# Allegro board PCB_ESP32-P4X_Function_EV_Board_V1.6_20250618.brd
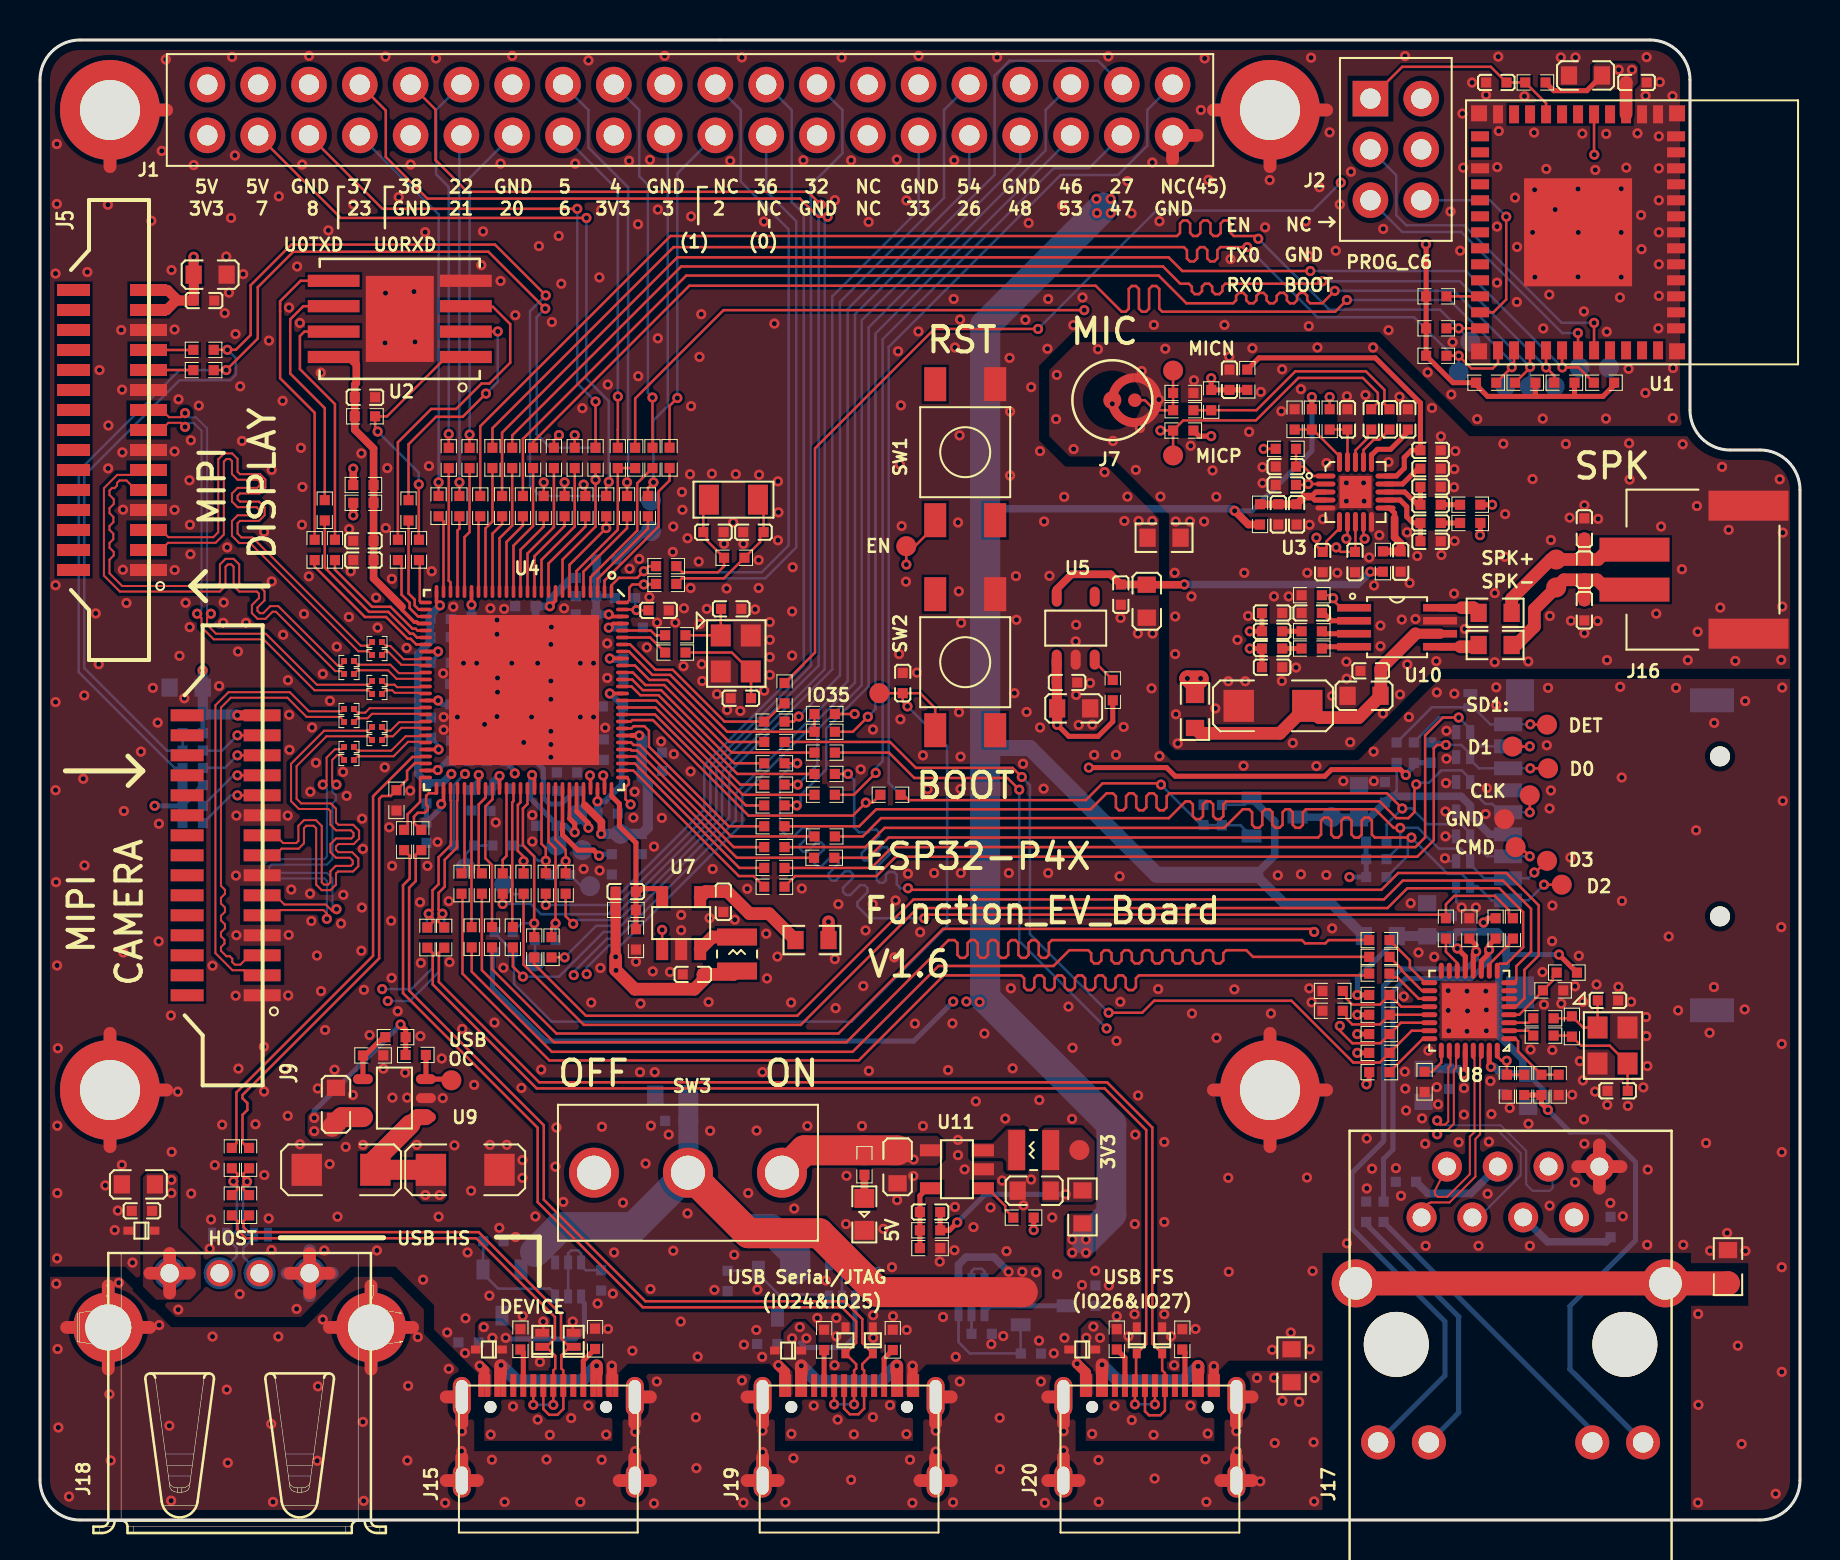
[diagram p0: board, top side]
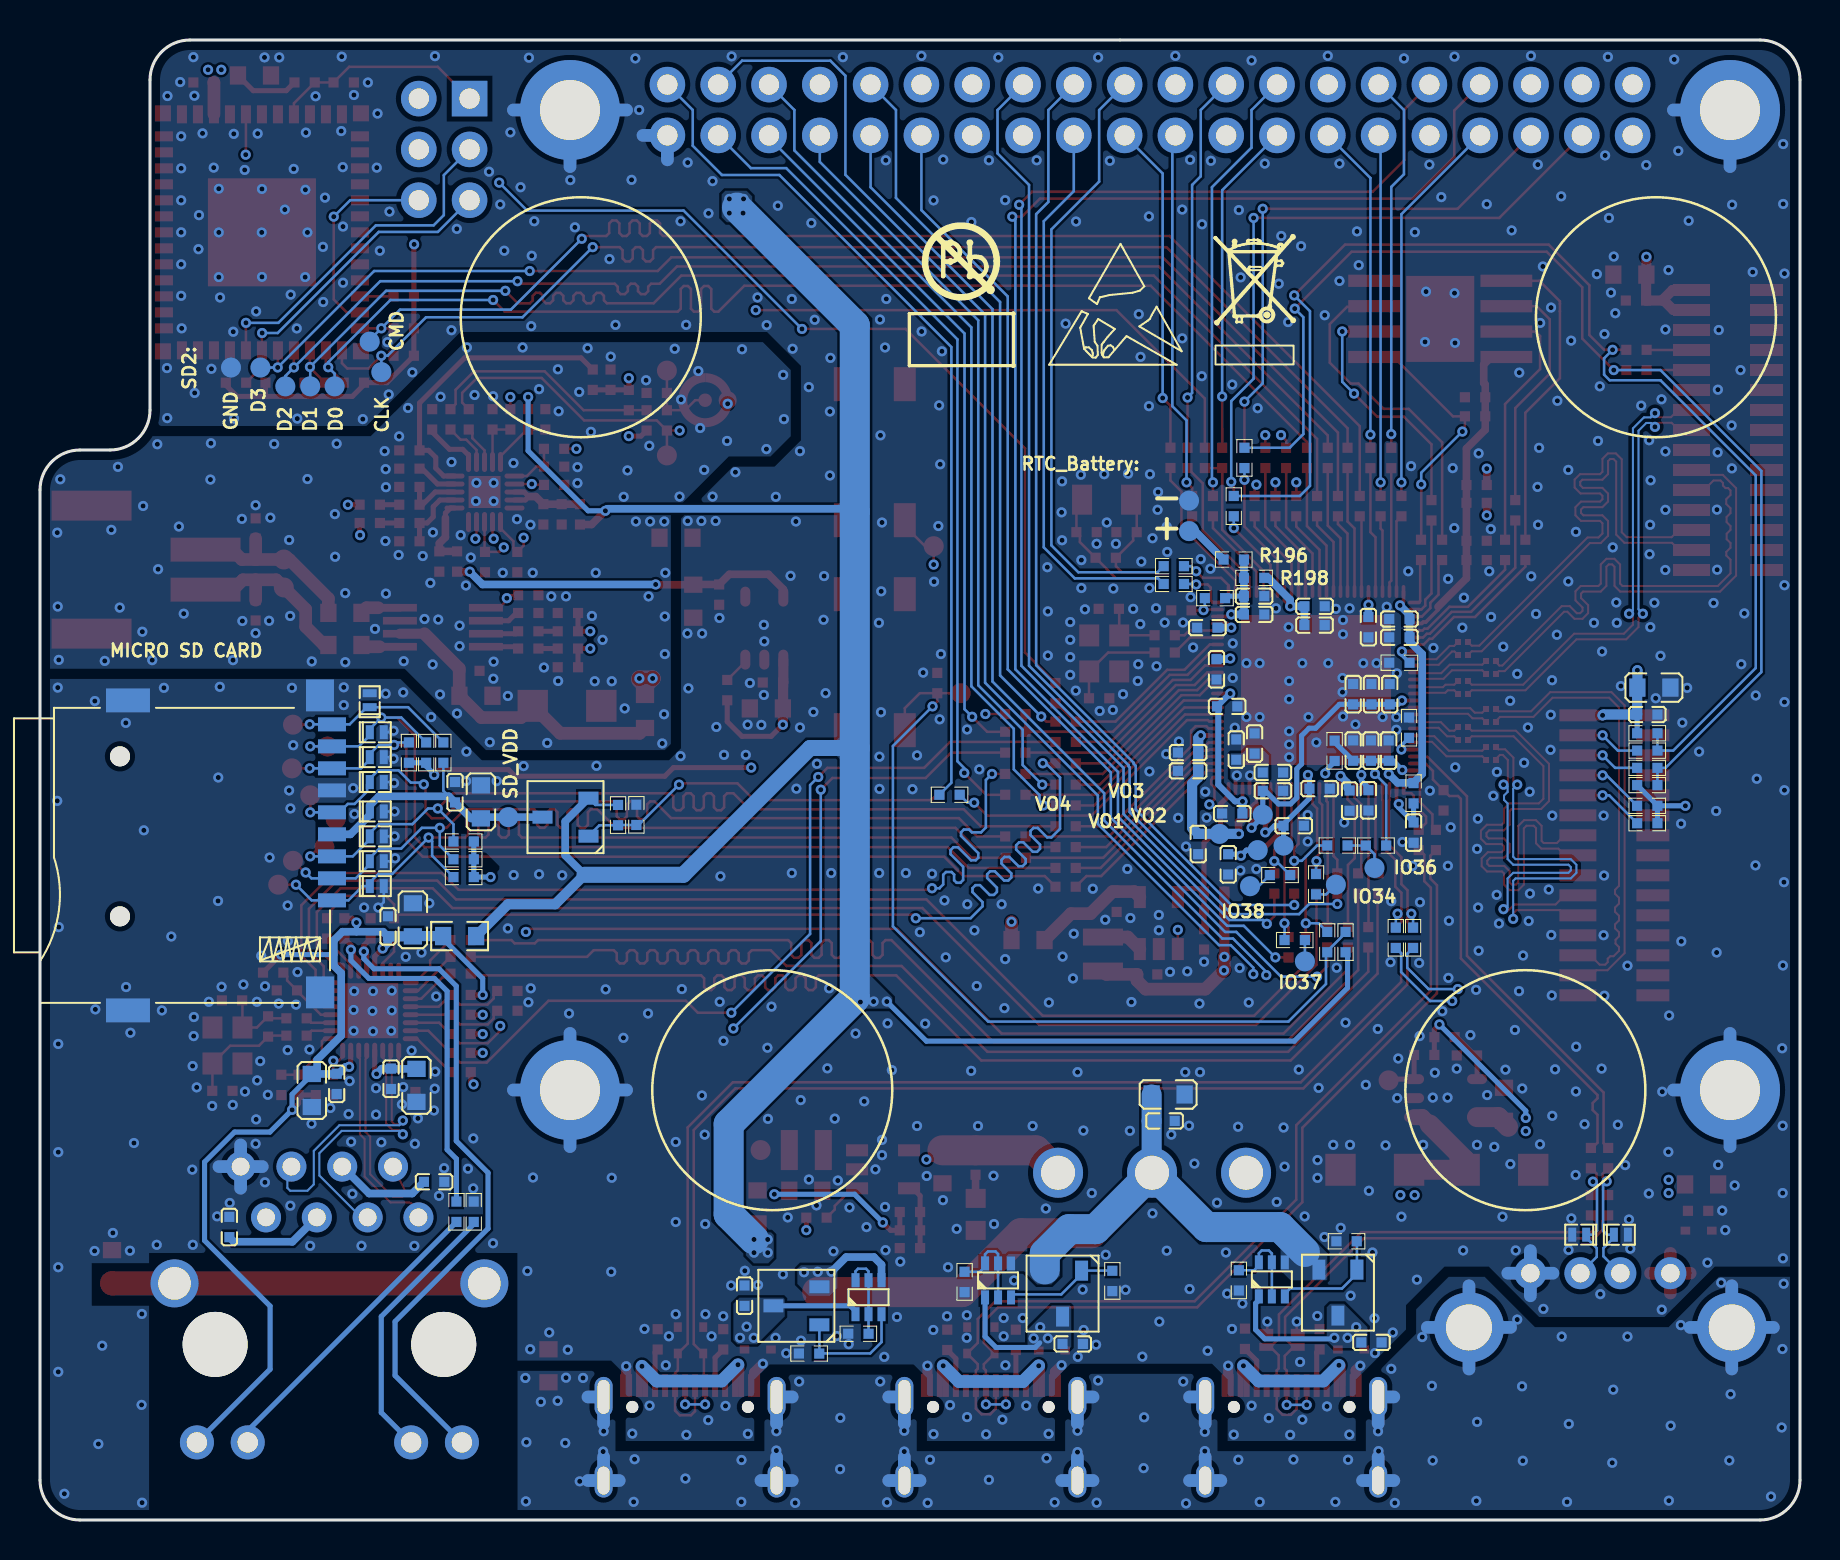
[diagram p1: board, bottom side, seen from below]

Outline 88 x 74 mm; copper layers: TOP, GND, POWER, BOTTOM. Coordinates in mm from the lower left corner of the outline.
Outline path: 0,72 0,2 arc(0.59,0.59) 2,0 86,0 arc(87.41,0.59) 88,2 88,51.5 arc(87.41,52.91) 86,53.5 84.5,53.5 arc(83.09,54.09) 82.5,55.5 82.5,72 arc(81.91,73.41) 80.5,74 2,74 arc(0.59,73.41) 0,72

## Design rules (mm)
net group CSI_A_CLKN: nets CSI_A_CLKN CSI_CLKN
net group CSI_A_CLKP: nets CSI_A_CLKP CSI_CLKP
net group CSI_A_DATA0N: nets CSI_A_DATA0N CSI_DATA0N
net group CSI_A_DATA0P: nets CSI_A_DATA0P CSI_DATA0P
net group CSI_A_DATA1N: nets CSI_A_DATA1N CSI_DATA1N
net group CSI_A_DATA1P: nets CSI_A_DATA1P CSI_DATA1P
net group DP_USB1P1: nets USB1P1_N USB1P1_P
net group DP_USB_DM_C: nets USB_DM_C USB_DP_C
net group DSI_CLKN: nets DSI_A_CLKN DSI_CLKN
net group DSI_CLKP: nets DSI_A_CLKP DSI_CLKP
net group DSI_DATA0N: nets DSI_A_DATA0N DSI_DATA0N
net group DSI_DATA0P: nets DSI_A_DATA0P DSI_DATA0P
net group DSI_DATA1N: nets DSI_A_DATA1N DSI_DATA1N
net group DSI_DATA1P: nets DSI_A_DATA1P DSI_DATA1P
net group RJ_RD: nets RD+ RD-
net group RJ_TD: nets TD+ TD-
net group USB1P1: nets GPIO24 GPIO25
net group USB2: nets USB_DM USB_DP

## Placement (name value [footprint] x y rotation side)
C1  10uF/10V(20%)  [C0603]  77.28 72.23 180 top
C2  0.1uF/50V(10%)  [C0402]  79.83 71.88 0 top
C7  10uF/10V(20%)  [C0603]  8.51 62.27 0 top
C8  1uF/16V(10%)  [C0402]  72.81 71.88 180 top
C10  0.1uF/50V(10%)  [C0402]  8.2 60.97 0 top
C14  0.1uF/50V(10%)  [C0402]  67.25 36.39 90 bottom
C15  10uF/10V(20%)  [C0603]  65.95 35.91 90 bottom
C16  0.1uF/50V(10%)  [C0402]  16.25 56.14 0 top
C18  22pF/50V(5%)  [C0402]  33.67 49.39 0 top
C19  22pF/50V(5%)  [C0402]  35.67 49.39 180 top
C20  1uF/16V(10%)  [C0402]  16.17 48.96 180 top
C21  0.1uF/50V(10%)  [C0402]  61.92 50.28 270 top
C22  0.1uF/50V(10%)  [C0402]  62.83 50.28 270 top
C23  22pF/50V(5%)  [C0402]  62.29 51.76 180 top
C24  22pF/50V(5%)  [C0402]  62.29 52.67 180 top
C25  0.1uF/50V(10%)  [C0402]  16.17 48 180 top
C26  22pF/50V(5%)  [C0402]  64.13 47.89 270 top
C27  22pF/50V(5%)  [C0402]  65.37 55.03 90 top
C28  22pF/50V(5%)  [C0402]  34.56 45.56 0 top
C29  22pF/50V(5%)  [C0402]  65.75 47.9 270 top
C30  0.1uF/50V(10%)  [C0402]  30.93 45.48 0 top
C31  10uF/10V(20%)  [C0603]  55.34 45.94 270 top
C32  1uF/16V(10%)  [C0402]  66.56 55.03 270 top
C33  0.1uF/50V(10%)  [C0402]  54.04 46.27 270 top
C34  1uF/16V(10%)  [C0402]  67.48 55.03 270 top
C35  1uF/16V(10%)  [C0402]  68.03 47.92 90 top
C36  1uF/16V(10%)  [C0402]  59.47 57.01 270 top
C37  1uF/16V(10%)  [C0402]  68.39 55.03 270 top
C38  22pF/50V(5%)  [C0402]  69.53 48.94 0 top
C39  1uF/16V(10%)  [C0402]  69.53 49.85 180 top
C40  1uF/16V(10%)  [C0402]  69.53 50.76 180 top
C41  22pF/50V(5%)  [C0402]  69.53 51.65 0 top
C42  1uF/16V(10%)  [C0402]  69.53 52.57 180 top
C43  1uF/16V(10%)  [C0402]  69.53 53.48 0 top
C44  0.1uF/50V(10%)(NC)  [C0402]  43.14 41.85 90 top
C45  22pF/50V(5%)  [C0402]  35.04 41.09 180 top
C46  10uF/10V(20%)  [C0603]  7.31 41.62 180 bottom
C47  0.1uF/50V(10%)  [C0402]  7.64 40.27 180 bottom
C48  0.1uF/50V(10%)  [C0402]  51.35 41.87 0 top
C49  10uF/10V(20%)  [C0603]  51.68 40.58 0 top
C50  1uF/16V(10%)  [C0402]  25.31 34.71 180 bottom
C51  1uF/16V(10%)  [C0402]  30.09 33.8 270 bottom
C53  22pF/50V(5%)(NC)  [C0402]  29.29 31.42 0 top
C54  4.7uF/6.3V(20%)  [C0402]  34.17 30.91 270 top
C55  1uF/16V(10%)  [C0402]  26.35 36.46 180 bottom
C56  1uF/16V(10%)  [C0402]  28.59 32.78 270 bottom
C57  22pF/50V(5%)  [C0402]  61.61 42.64 0 top
C58  0.1uF/50V(10%)  [C0402]  61.61 43.57 0 top
C59  0.1uF/50V(10%)  [C0402]  61.61 44.44 0 top
C60  22pF/50V(5%)  [C0402]  61.61 45.35 0 top
C61  22uF/6.3V(20%)  [C0402]  32.64 27.28 180 top
C62  1uF/16V(10%)  [C0402]  63.59 45.35 180 top
C63  100uF/10V(20%)  [C1206]  61.65 40.71 180 top
C64  20pF/50V(5%)  [C0402]  78.4 25.98 0 top
C65  10uF/10V(20%)  [C0603]  14.8 20.79 90 top
C66  1uF/16V(10%)  [C0402]  66.53 42.46 180 top
C67  10uF/10V(20%)(NC)  [C0603]  66.2 41.21 0 top
C68  20pF/50V(5%)  [C0402]  78.88 21.46 180 top
C69  22pF/50V(5%)(NC)  [C0402]  44.5 15.4 180 top
C70  10uF/10V(20%)  [C0603]  49.71 16.47 180 top
C71  10uF/10V(20%)  [C0603]  42.88 17.66 270 top
C72  100uF/10V(20%)  [C1206]  15.05 17.51 180 top
C73  10uF/10V(20%)  [C0603]  4.92 16.78 180 top
C74  0.1uF/50V(10%)  [C0402]  5.1 15.46 180 top
C75  100uF/10V(20%)  [C1206]  21.26 17.51 0 top
C76  1uF/16V(10%)  [C0402]  52.77 11.22 90 bottom
C77  330pF/50V(10%)(NC)  [C0402]  77.22 49.58 270 top
C78  330pF/50V(10%)(NC)  [C0402]  77.22 47.52 90 top
C79  22uF/10V(20%)  [C0603]  31.59 21.28 180 bottom
C80  0.1uF/50V(10%)  [C0402]  31.77 19.95 180 bottom
C81  330pF/50V(10%)(NC)  [C0402]  77.22 45.49 270 top
C82  10uF/6.3V(20%)  [C0402]  27.3 46.19 180 bottom
C83  0.1uF/50V(10%)  [C0402]  24.27 45.68 180 bottom
C84  0.1uF/50V(10%)  [C0402]  27.3 45.28 180 bottom
C85  0.1uF/50V(10%)  [C0402]  29.63 44.62 0 bottom
C86  0.1uF/50V(10%)  [C0402]  20.03 45.05 0 bottom
C87  10uF/6.3V(20%)  [C0402]  24.27 44.74 180 bottom
C88  0.1uF/50V(10%)  [C0402]  21.58 44.64 270 bottom
C89  0.1uF/50V(10%)  [C0402]  20.03 44.14 0 bottom
C90  0.1uF/50V(10%)  [C0402]  29.18 42.54 270 bottom
C91  1uF/16V(10%)  [C0402]  22.34 41.29 90 bottom
C92  0.1uF/50V(10%)  [C0402]  21.43 41.29 90 bottom
C93  10nF/50V(10%)  [C0402]  20.51 41.29 90 bottom
C94  0.1uF/50V(10%)  [C0402]  28.64 40.68 180 bottom
C95  10uF/6.3V(20%)  [C0402]  28.19 38.52 90 bottom
C96  0.1uF/50V(10%)  [C0402]  27.27 38.82 90 bottom
C97  0.1uF/50V(10%)  [C0402]  22.52 35.97 270 bottom
C98  4.7uF/6.3V(20%)  [C0402]  22.34 38.47 90 bottom
C99  0.1uF/50V(10%)  [C0402]  21.45 38.47 90 bottom
C100  10nF/50V(10%)  [C0402]  20.56 38.47 90 bottom
C101  0.1uF/50V(10%)  [C0402]  30.59 38.37 0 bottom
C102  10uF/6.3V(20%)  [C0402]  30.59 37.46 0 bottom
C103  0.1uF/50V(10%)  [C0402]  26.35 37.38 180 bottom
C104  1uF/16V(10%)  [C0402]  24.02 36.57 180 bottom
C105  0.1uF/50V(10%)  [C0402]  21.58 35.98 270 bottom
C107  10uF/6.3V(20%)  [C0402]  28.39 35.32 0 bottom
C108  10uF/10V(20%)  [C0603]  69.36 30.01 90 bottom
C109  0.1uF/50V(10%)  [C0402]  70.6 29.68 90 bottom
C110  1uF/16V(10%)  [C0402]  21.43 8.88 180 bottom
C111  0.1uF/50V(10%)  [C0402]  70.45 22.06 270 bottom
C112  0.1uF/50V(10%)  [C0402]  73.17 21.81 270 bottom
C113  10uF/10V(20%)  [C0603]  69.18 21.73 270 bottom
C114  10uF/10V(20%)  [C0603]  74.41 21.48 270 bottom
C115  0.1uF/50V(10%)  [C0402]  68.3 16.91 180 bottom
C116  0.1uF/50V(10%)  [C0402]  78.53 14.65 90 bottom
C117  1uF/16V(10%)  [C0402]  36.36 8.8 180 bottom
C118  0.1uF/50V(10%)  [C0402]  19.32 34.37 270 bottom
D3  BSDFN2C031U  [SOD882]  71.16 35.43 0 bottom
D4  BSDFN2C031U  [SOD882]  71.16 34.18 0 bottom
D5  BSDFN2C031U  [SOD882]  71.52 40.99 270 bottom
D6  BSDFN2C031U  [SOD882]  71.16 36.9 0 bottom
D7  BSDFN2C031U  [SOD882]  71.16 32.94 0 bottom
D8  BSDFN2C031U  [SOD882]  71.16 31.69 0 bottom
D10  BSDFN2C031U  [SOD882]  71.16 39.39 0 bottom
D11  BSDFN2C031U  [SOD882]  71.16 38.14 0 bottom
D12  RED LED  [LED0603]  41.21 15.28 90 top
D13  LESD5D5.0CT1G  [SOD523]  22.44 8.52 0 top
D14  ESD7951ST5G  [SOD882]  25.11 9.01 270 top
D15  LESD5D5.0CT1G  [SOD523]  5.07 14.47 0 top
D16  ESD7951ST5G  [SOD882]  26.69 9.01 270 top
D17  LESD5D5.0CT1G  [SOD523]  40.27 8.98 270 top
D18  LESD5D5.0CT1G  [SOD523]  41.64 8.98 270 top
D19  LESD5D5.0CT1G  [SOD523]  37.4 8.47 0 top
D20  LESD5D5.0CT1G  [SOD523]  52.11 8.52 0 top
D21  ESD7951ST5G(NC)  [SOD882]  11.04 14.27 180 bottom
D22  ESD7951ST5G(NC)  [SOD882]  8.96 14.26 0 bottom
D23  LESD5D5.0CT1G  [SOD523]  56.11 8.98 270 top
D24  LESD5D5.0CT1G  [SOD523]  54.84 8.98 270 top
H1  STD  [HOLE5_3]  3.5 70.5 0 top
H2  STD  [HOLE5_3]  61.5 70.5 0 top
H3  STD  [HOLE5_3]  3.5 21.5 0 top
H4  STD  [HOLE5_3]  61.5 21.5 0 top
J1  CON20X2  [CON20X2_2P54]  32.5 70.5 0 top
J2  CON3X2  [CON3X2_2P54]  67.79 68.53 270 top
J5  DSI_1-1734248-5  [FFC_15P_1_MIPI]  3.55 54.5 270 top
J7  MIC_ELECT  [MIC2_4_B4013AM422-042]  53.62 55.99 90 top
J9  CSI_1-1734248-5  [FFC_15P_1_MIPI]  9.23 33.23 270 top
J15  -  [USB_TYPEC_16P_F]  25.42 5.65 0 top
J16  A2001WR-S-2P  [CON2X1_2P0_SMT_PH2A-S-A]  79.72 47.52 90 top
J17  RJ45_HR913550A  [RJ45_HR913129A]  73.53 8.78 180 top
J18  USB-02  [292303-6]  9.98 9.63 0 top
J19  -  [USB_TYPEC_16P_F]  40.46 5.65 0 top
J20  -  [USB_TYPEC_16P_F]  55.5 5.65 0 top
J21  TF_CARD  [TF_CARDA]  84 34.18 0 bottom
L1  2.2uH  [L2520]  34.85 28.3 270 top
L2  0(1%)  [R0603]  72.76 43.75 180 top
L3  0(1%)  [R0603]  72.76 45.36 180 top
L4  2.2uH  [L2520]  49.68 18.5 0 top
NOREF  -  []  0 72 0 top
NOREF#2  -  []  86 53.5 90 top
NOREF#3  -  []  0 0 0 top
NOREF#4  -  []  0 0 90 top
Q2  LMBT3906DW1T1G  [SOT-363]  46.57 11.14 90 bottom
Q3  AO3401A  [SOT23-3]  50.18 10.71 0 bottom
Q4  AO3401A  [SOT23-3]  23.1 11.37 270 bottom
Q5  LMBT3906DW1T1G  [SOT-363]  26.41 12.03 90 bottom
Q6  LMBT3906DW1T1G  [SOT-363]  40.1 11.98 90 bottom
Q7  AO3401A  [SOT23-3]  36.87 11.32 270 bottom
Q8  AO3401A  [SOT23-3]  61.73 35.14 0 bottom
R1  51K(1%)  [R0402]  78.2 56.87 180 top
R3  51K(1%)  [R0402]  76.22 56.87 180 top
R4  10K(1%)  [R0402]  74.77 71.88 0 top
R5  51K(1%)  [R0402]  74.26 56.87 180 top
R6  51K(1%)  [R0402]  72.31 56.87 0 top
R8  0(1%)  [R0402]  8.18 58.51 180 top
R9  0(1%)  [R0402]  8.18 57.49 180 top
R10  10K(1%)  [R0402]  69.81 61.18 180 top
R11  51K(1%)  [R0402]  69.81 59.58 0 top
R12  51K(1%)  [R0402]  69.81 58.21 0 top
R16  51K(1%)  [R0402]  67.83 38.37 90 bottom
R17  51K(1%)  [R0402]  66.82 33.92 0 bottom
R18  10K(1%)  [R0402]  16.25 55.18 180 top
R19  51K(1%)  [R0402]  66.82 33.04 0 bottom
R21  51K(1%)  [R0402]  66.82 32.15 0 bottom
R22  0(1%)  [R0402]  31.48 53.11 270 top
R23  0(1%)  [R0402]  22.62 53.1 270 top
R24  0(1%)  [R0402]  23.61 53.1 270 top
R25  0(1%)  [R0402]  24.65 53.1 270 top
R26  0(1%)  [R0402]  25.69 53.1 270 top
R27  0(1%)  [R0402]  26.74 53.1 270 top
R28  0(1%)  [R0402]  27.78 53.1 270 top
R29  0(1%)  [R0402]  28.89 53.1 270 top
R30  0(1%)  [R0402]  29.76 53.1 90 top
R31  0(1%)  [R0402]  30.62 53.1 270 top
R32  0(1%)  [R0402]  20.44 53.1 270 top
R33  0(1%)  [R0402]  21.48 53.1 270 top
R34  51K(1%)  [R0402]  68.69 38.37 90 bottom
R35  0(1%)(NC)  [R0402]  16.17 51.75 0 top
R36  51K(1%)  [R0402]  69.55 38.37 90 bottom
R37  0(1%)  [R0402]  16.17 50.86 0 top
R38  0(1%)  [R0402]  19.93 50.69 270 top
R39  0(1%)  [R0402]  20.97 50.69 270 top
R40  0(1%)  [R0402]  22.01 50.69 270 top
R41  0(1%)  [R0402]  23.1 50.69 270 top
R42  0(1%)  [R0402]  24.15 50.69 270 top
R43  0(1%)  [R0402]  25.19 50.69 270 top
R44  0(1%)  [R0402]  26.23 50.69 270 top
R45  0(1%)  [R0402]  27.27 50.69 270 top
R46  0(1%)  [R0402]  28.31 50.69 270 top
R47  0(1%)  [R0402]  29.35 50.69 270 top
R48  0(1%)  [R0402]  30.39 50.69 270 top
R49  0(1%)  [R0402]  14.24 50.49 270 top
R50  0(1%)  [R0402]  18.43 50.49 270 top
R51  0(1%)  [R0402]  61 50.28 90 top
R52  0(1%)  [R0402]  62.29 53.56 0 top
R53  0(1%)  [R0402]  13.73 48.5 270 top
R54  0(1%)  [R0402]  14.75 48.5 270 top
R55  0(1%)  [R0402]  17.89 48.5 270 top
R56  0(1%)  [R0402]  18.95 48.5 270 top
R57  10K(1%)  [R0402]  62.73 55.03 270 top
R58  10M(1%)(NC)  [R0402]  34.71 48.11 180 top
R59  0(1%)  [R0402]  31.31 47.69 0 top
R60  10K(1%)(NC)  [R0402]  63.59 55.03 90 top
R61  0(1%)  [R0402]  31.31 46.8 0 top
R62  0(1%)  [R0402]  64.48 55.03 270 top
R63  2.2K(1%)  [R0402]  57.16 54.47 0 top
R64  0(1%)(NC)  [R0402]  57.16 55.49 0 top
R65  2.2K(1%)  [R0402]  58.56 56 90 top
R66  0(1%)  [R0402]  57.16 56.35 0 top
R67  0(1%)  [R0402]  31.77 44.24 0 top
R68  0(1%)  [R0402]  67.15 47.92 270 top
R69  0(1%)  [R0201]  16.85 43.9 0 top
R70  0(1%)  [R0402]  31.77 43.37 0 top
R71  0(1%)  [R0201]  16.85 43.25 0 top
R72  0(1%)  [R0201]  15.45 42.95 0 top
R73  200(1%)  [R0402]  60.36 57.01 90 top
R74  0(1%)  [R0201]  15.45 42.3 0 top
R75  0(1%)  [R0201]  16.85 41.95 0 top
R76  0(1%)  [R0402]  37.23 41.34 90 top
R77  0(1%)  [R0201]  16.85 41.3 0 top
R78  100(1%)  [R0201]  15.45 40.55 180 top
R79  0(1%)  [R0402]  39.23 40.3 0 top
R80  0(1%)  [R0402]  36.72 39.92 180 top
R81  100(1%)  [R0201]  15.45 39.9 180 top
R82  100(1%)  [R0201]  16.85 39.65 180 top
R83  0(1%)  [R0402]  71.51 49.85 0 top
R84  0(1%)  [R0402]  71.51 50.76 0 top
R85  0(1%)  [R0402]  39.23 39.41 180 top
R86  100(1%)  [R0201]  16.85 39 180 top
R87  0(1%)  [R0402]  36.72 38.9 0 top
R88  100(1%)  [R0201]  15.45 38.65 180 top
R89  0(1%)  [R0402]  39.23 38.37 0 top
R90  100(1%)  [R0201]  15.45 38 180 top
R91  0(1%)  [R0402]  36.72 37.84 0 top
R92  0(1%)  [R0402]  39.23 37.3 0 top
R93  0(1%)  [R0402]  36.72 36.77 0 top
R94  0(1%)  [R0402]  39.23 36.26 0 top
R97  0(1%)  [R0402]  36.72 35.73 0 top
R98  2.2K(1%)  [R0402]  7.64 39.33 180 bottom
R99  0(1%)  [R0603]  56.2 49.11 180 top
R100  0(1%)(NC)  [R0402]  42.52 36.26 0 bottom
R101  0(1%)  [R0402]  7.64 38.47 0 bottom
R102  0(1%)  [R0402]  36.72 34.69 0 top
R103  0(1%)  [R0402]  39.23 34.18 0 top
R104  33(1%)  [R0402]  18.2 34 270 top
R105  33(1%)  [R0402]  19.07 34 270 top
R106  0(1%)  [R0402]  7.64 37.61 0 bottom
R107  0(1%)  [R0402]  36.72 33.65 0 top
R108  0(1%)  [R0402]  39.21 33.11 0 top
R109  2.2K(1%)  [R0402]  7.64 36.74 180 bottom
R110  0(1%)  [R0402]  36.72 32.6 0 top
R111  10K(1%)(NC)  [R0402]  7.64 35.71 0 bottom
R112  0(1%)  [R0402]  25.29 31.82 270 top
R113  33(1%)  [R0402]  19.37 29.12 270 top
R114  0(1%)  [R0402]  21.08 31.82 270 top
R115  0(1%)  [R0402]  22.09 31.82 270 top
R116  0(1%)  [R0402]  23.13 31.82 270 top
R117  0(1%)  [R0402]  24.18 31.82 270 top
R118  0(1%)  [R0402]  26.28 31.82 270 top
R122  0(1%)  [R0402]  36.72 31.66 0 top
R123  10K(1%)  [R0402]  7.64 34.84 0 bottom
R127  0(1%)  [R0603]  38.6 29 180 top
R128  499K(1%)(NC)  [R0402]  29.29 30.51 0 top
R131  33(1%)  [R0402]  20.21 29.12 270 top
R132  0(1%)  [R0402]  21.59 29.14 270 top
R133  0(1%)  [R0402]  22.6 29.14 270 top
R134  0(1%)  [R0402]  23.64 29.14 270 top
R135  0(1%)  [R0402]  24.71 28.64 270 top
R136  0(1%)  [R0402]  25.58 28.64 270 top
R138  499K(1%)(NC)  [R0402]  29.8 29.03 270 top
R139  0(1%)  [R0402]  70.3 29.58 270 top
R140  5.1K(1%)  [R0402]  71.47 29.58 270 top
R141  5.1K(1%)  [R0402]  72.78 29.58 270 top
R142  0(1%)  [R0402]  73.64 29.58 270 top
R143  0(1%)  [R0402]  66.97 29 0 top
R144  0(1%)  [R0402]  66.97 28.16 0 top
R145  10K(1%)  [R0402]  17.78 24.14 180 top
R146  150K(1%)  [R0402]  63.59 43.57 0 top
R147  150K(1%)  [R0402]  63.59 44.44 0 top
R148  10K(1%)  [R0402]  63.59 46.24 180 top
R149  5.1K(1%)  [R0402]  76.34 27.37 180 top
R150  0(1%)  [R0402]  66.97 27.32 0 top
R151  10K(1%)  [R0402]  18.79 23.25 0 top
R152  10K(1%)(NC)  [R0402]  16.65 23.23 180 top
R153  5.1K(1%)(NC)  [R0402]  75.66 26.48 0 top
R154  5.1K(1%)(NC)  [R0402]  64.63 26.45 180 top
R155  5.1K(1%)  [R0402]  66.97 26.25 0 top
R156  5.1K(1%)(NC)  [R0402]  64.63 25.46 180 top
R157  5.1K(1%)  [R0402]  66.97 25.26 0 top
R158  0(1%)  [R0402]  75.17 25.08 0 top
R159  10M(1%)(NC)  [R0402]  76.6 24.68 270 top
R160  1.5K(1%)(NC)  [R0402]  66.97 24.3 0 top
R161  0(1%)  [R0402]  75.17 24.22 0 top
R163  1.5K(1%)  [R0402]  66.97 23.36 0 top
R164  5.1K(1%)(NC)  [R0402]  66.97 22.39 0 top
R165  6.19K(1%)  [R0402]  69.23 21.91 270 top
R166  10K(1%)(NC)  [R0402]  73.34 21.76 270 top
R167  10K(1%)(NC)  [R0402]  74.21 21.76 90 top
R168  5.1K(1%)(NC)  [R0402]  75.07 21.76 90 top
R169  5.1K(1%)  [R0402]  75.93 21.76 270 top
R170  22.1K(1%)  [R0402]  44.5 13.6 0 top
R171  0(1%)  [R0603]  57.75 40.43 90 top
R172  100K(1%)  [R0402]  44.5 14.48 180 top
R173  10K(1%)  [R0402]  49.18 15.12 180 top
R174  0(1%)  [R0603]  52.12 15.65 270 top
R175  5.1K(1%)  [R0402]  41.22 17.77 90 top
R176  10K(1%)  [R0402]  47.08 9.31 180 bottom
R177  51K(1%)  [R0402]  49.55 8.32 180 bottom
R178  0(1%)  [R0402]  9.59 15.74 90 top
R179  0(1%)  [R0402]  10.45 15.74 90 top
R180  5.1K(1%)  [R0402]  24.02 9.03 270 top
R181  0(1%)  [R0603]  84.4 12.67 90 top
R182  5.1K(1%)  [R0402]  27.75 9.06 270 top
R183  5.1K(1%)  [R0402]  42.64 9.01 270 top
R184  5.1K(1%)  [R0402]  39.21 9.01 270 top
R185  5.1K(1%)  [R0402]  53.84 9.03 270 top
R186  5.1K(1%)  [R0402]  57.12 9.03 270 top
R187  0(1%)  [R0603]  62.58 7.71 90 top
R190  0(1%)  [R0402]  27.78 53.1 270 bottom
R194  0(1%)  [R0402]  28.31 50.69 270 bottom
R196  0(1%)(NC)  [R0402]  28.31 48.02 180 bottom
R197  0(1%)(NC)  [R0402]  31.31 47.69 180 bottom
R198  0(1%)  [R0402]  27.3 47.11 0 bottom
R199  0(1%)(NC)  [R0402]  31.31 46.8 180 bottom
R200  10K(1%)  [R0402]  29.25 46.09 0 bottom
R202  4.02K(1%)  [R0402]  20.03 42.86 0 bottom
R203  4.02K(1%)  [R0402]  19.55 39.61 90 bottom
R204  0(1%)  [R0402]  23.13 33.72 180 bottom
R205  0(1%)  [R0402]  24.2 31.79 90 bottom
R206  0(1%)  [R0402]  26 32.25 0 bottom
R207  0(1%)  [R0402]  23.64 28.9 270 bottom
R208  10K(1%)  [R0402]  22.72 28.9 270 bottom
R209  10K(1%)  [R0402]  21.2 33.72 180 bottom
R212  0(1%)  [R0402]  25.26 29 180 bottom
R213  0(1%)  [R0603]  67.02 29.2 0 bottom
R216  51K(1%)  [R0402]  22.67 13.93 180 bottom
R217  10K(1%)  [R0402]  28.06 11.98 90 bottom
R220  0(1%)  [R0402]  10.45 18.1 90 top
R221  0(1%)  [R0402]  9.59 18.1 90 top
R222  1K(1%)  [R0402]  67.18 15.41 90 bottom
R223  1K(1%)  [R0402]  66.31 15.41 90 bottom
R224  10K(1%)  [R0402]  41.77 11.9 90 bottom
R225  51K(1%)  [R0402]  34.38 11.95 90 bottom
R226  10K(1%)  [R0402]  53.64 41.49 270 top
R227  33(1%)  [R0402]  20.21 29.11 270 bottom
R228  33(1%)  [R0402]  19.35 29.11 270 bottom
R229  10K(1%)  [R0402]  58.18 35.26 270 bottom
R230  10K(1%)(NC)  [R0402]  59.1 35.25 90 bottom
R231  0(1%)  [R0402]  42.52 36.26 0 top
R232  0(1%)  [R0402]  19.32 36.34 90 bottom
R233  0(1%)  [R0402]  23.27 38.46 270 bottom
R234  1M(1%)(NC)  [R0402]  17.82 35.98 270 top
SW1  SW_SP_4P  [SW4-4P5X4P5X2P9-SMT]  46.26 53.39 270 top
SW2  SW_SP_4P  [SW4-4P5X4P5X2P9-SMT]  46.26 42.89 270 top
SW3  -  [SS-12D10L3]  32.4 17.36 180 top
TP1  TESTPOINT  [TPC1]  30.55 50.97 180 bottom
TP2  TESTPOINT  [TPC1]  30.55 49.44 180 bottom
TP3  TESTPOINT  [TPC1]  78.45 57.62 90 bottom
TP4  TESTPOINT  [TPC1]  71.52 58.92 90 bottom
TP5  TESTPOINT  [TPC1]  70.93 57.39 90 bottom
TP6  TESTPOINT  [TPC1]  76.98 57.62 90 bottom
TP7  TESTPOINT  [TPC1]  75.73 56.68 90 bottom
TP8  TESTPOINT  [TPC1]  74.49 56.68 90 bottom
TP9  TESTPOINT  [TPC1]  73.27 56.68 90 bottom
TP10  TESTPOINT  [TPC1]  75.35 39.77 0 top
TP11  TESTPOINT  [TPC1]  56.66 53.23 90 top
TP12  TESTPOINT  [TPC1]  73.22 35.04 270 top
TP13  TESTPOINT  [TPC1]  64.58 35.14 270 bottom
TP14  TESTPOINT  [TPC1]  73.78 33.65 270 top
TP15  TESTPOINT  [TPC1]  74.49 36.24 270 top
TP16  TESTPOINT  [TPC1]  75.35 32.96 270 top
TP17  TESTPOINT  [TPC1]  76.09 31.77 270 top
TP18  TESTPOINT  [TPC1]  73.63 38.67 270 top
TP19  TESTPOINT  [TPC1]  75.4 37.58 270 top
TP20  TESTPOINT  [TPC1]  56.66 57.47 90 top
TP22  TESTPOINT  [TPC1]  41.97 41.34 180 top
TP23  TESTPOINT  [TPC1]  43.31 48.69 180 top
TP24  TESTPOINT  [TPC1]  25.82 33.72 270 bottom
TP25  TESTPOINT  [TPC1]  29.02 34.31 270 bottom
TP26  TESTPOINT  [TPC1]  27.12 33.49 270 bottom
TP27  TESTPOINT  [TPC1]  26.86 35.27 270 bottom
TP28  TESTPOINT  [TPC1]  20.57 21.98 0 top
TP30  TESTPOINT  [TPC1]  51.97 18.5 0 top
TP31  TESTPOINT  [TPC1]  75.81 46.63 0 top
TP32  TESTPOINT  [TPC1]  75.81 48.02 0 top
TP33  TESTPOINT  [TPC1]  21.28 32.6 180 bottom
TP34  TESTPOINT  [TPC1]  23.21 31.77 180 bottom
TP35  TESTPOINT  [TPC1]  27.5 31.69 180 bottom
TP36  TESTPOINT  [TPC1]  24.76 27.93 180 bottom
U1  -  [ESP32-C6-MINI-1]  71.3 70.98 270 top
U2  FLASH-3V3  [WSON6X8]  17.99 60.05 90 top
U3  ES8311  [QFN20_0P4_3]  65.77 51.4 0 top
U4  ESP32-P4  [QFN104_0P35_10_E7P5_A]  24.2 41.5 270 top
U5  ME6211C33M5G-N  [SOT23-5]  51.78 44.59 90 top
U7  TLV62569  [SOT23_0P95_2P6]  32.06 29.85 90 top
U8  IP101GRI  [QFN32_0P4_4_E2P75]  71.46 25.46 180 top
U9  TPS2051CDBVR  [SOT23-5]  17.72 21.09 180 top
U10  NS4150B  [SSOP8_0P65_5]  67.85 44.64 0 top
U11  TLV62569  [SOT23_0P95_2P6]  45.85 17.54 180 top
Y1  32.768KHz  [XTAL3215]  34.67 51.02 0 top
Y2  40MHz  [XTAL3225]  34.79 43.33 270 top
Y3  25MHz+/-10ppm  [XTAL3225]  78.63 23.73 270 top

## Library data of the parts
C1 C2 C7 C8 C10 C14-C16 C18 C19 C25 C28 C30 C31 C33 C44-C51 C53 C55 C56 C63 C65 C69 C72-C76 C79 C80 C83-C86 C88-C90 C92 C94 C96 C97 C99 C101 C103 C105 C110 C117 C118 = CAPACITOR
C20 C54 C61 C70 C71 C82 C87 C91 C93 C95 C98 C100 C102 C104 C107 = CAP
C21-C24 C26 C27 C29 C32 C34-C43 C57-C60 C62 C64 C66-C68 C77 C78 C81 C108 C109 C111-C116 = CAP NP
D3-D8 D10 D11 D13-D24 = DIODE_BI_DIR
D12 = DIODE_LIGHT
H1-H4 = STD
J1 = CON20X2
J2 = CON3X2
J5 = DSI_1-1734248-5
J7 = MIC_ELECT
J9 = CSI_1-1734248-5
J15 J19 J20 = USB_TYPEC_16P_F
J16 = SPEAKER_0
J17 = RJ45_trans_100_2LED
J18 = USB_0
J21 = TF_SD_SOCKET
L1-L4 = INDUCTOR
Q2 Q5 Q6 = DUAL_PNP
Q3 Q4 Q7 Q8 = PMOS
R1 R3-R6 R8-R12 R16-R19 R21-R50 R53-R56 R58 R59 R61 R67 R70 R76 R79 R80 R85 R87 R89 R91-R94 R97-R118 R122 R123 R127 R128 R131-R136 R138-R145 R149-R161 R163-R170 R172-R187 R190 R194 R196-R200 R202-R209 R212 R213 R216 R217 R220-R234 = RESISTOR
R51 R52 R57 R60 R62-R66 R68 R73 R83 R84 R146-R148 R171 = RESISTOR_0
R69 R71 R72 R74 R75 R77 = RESISTOR: signal model: RESISTOR_R0201_0(1%)_0(1%)
R78 R81 R82 R86 R88 R90 = RESISTOR: signal model: RESISTOR_R0201_100(1%)_100(1%)
SW1 SW2 = SW_SP_4P
SW3 = SS-12D10L3
TP1-TP20 TP22-TP27 TP30-TP36 = TESTPOINT
TP28 = TESTPOINT_3
U1 = ESP32-C6-MINI-1
U2 = FLASH_4
U3 = ES8311
U4 = ESP32-P4_QFN104_ECO5
U5 = LDO_SOT23-5_3
U7 U11 = TLV62565
U8 = ESP8080_6
U9 = AP22802_2
U10 = LM25085MY_2
Y1 = XTAL_2P
Y2 = XTAL
Y3 = X1_0

## Footprints (pads in the part's own frame, mm; a bottom-side part is the same pattern mirrored in y, then rotated)
292303-6
  round 1.32 hole 0.92: 1(-3.5,2.71) 2(-1,2.71) 3(1,2.71) 4(3.5,2.71)
  round 3.5 hole 2.3: 5(-6.57,0) 6(6.57,0)
C0402
  rect 0.508x0.508 smd: 1(-0.508,0) 2(0.508,0)
C0603
  rect 0.813x0.914 smd: 1(-0.826,0) 2(0.826,0)
C1206
  rect 1.52x1.6 smd: 1(-1.714,0) 2(1.714,0)
CON2X1_2P0_SMT_PH2A-S-A
  rect 1.2x3.5 smd: 1(1,0) 2(-1,0)
  rect 1.5x4 smd: 3(-3.2,-5.7) 4(3.2,-5.7)
CON3X2_2P54
  rect 1.778x1.778 hole 1.016: 1(-2.54,-1.27)
  round 1.778 hole 1.016: 2(-2.54,1.27) 3(0,-1.27) 4(0,1.27) 5(2.54,-1.27) 6(2.54,1.27)
CON20X2_2P54
  round 1.778 hole 1.016: 1(-24.13,-1.27) 2(-24.13,1.27) 3(-21.59,-1.27) 4(-21.59,1.27) 5(-19.05,-1.27) 6(-19.05,1.27) 7(-16.51,-1.27) 8(-16.51,1.27) 9(-13.97,-1.27) 10(-13.97,1.27) 11(-11.43,-1.27) 12(-11.43,1.27) 13(-8.89,-1.27) 14(-8.89,1.27) 15(-6.35,-1.27) 16(-6.35,1.27) 17(-3.81,-1.27) 18(-3.81,1.27) 19(-1.27,-1.27) 20(-1.27,1.27) 21(1.27,-1.27) 22(1.27,1.27) 23(3.81,-1.27) 24(3.81,1.27) 25(6.35,-1.27) 26(6.35,1.27) 27(8.89,-1.27) 28(8.89,1.27) 29(11.43,-1.27) 30(11.43,1.27) 31(13.97,-1.27) 32(13.97,1.27) 33(16.51,-1.27) 34(16.51,1.27) 35(19.05,-1.27) 36(19.05,1.27) 37(21.59,-1.27) 38(21.59,1.27) 39(24.13,-1.27) 40(24.13,1.27)
ESP32-C6-MINI-1
  rect 0.9x0.5 smd: 1(0.7,9.6) 2(0.7,8.8) 3(0.7,8) 4(0.7,7.2) 5(0.7,6.4) 6(0.7,5.6) 7(0.7,4.8) 8(0.7,4) 9(0.7,3.2) 10(0.7,2.4) 11(0.7,1.6) 25(12.5,1.6) 26(12.5,2.4) 27(12.5,3.2) 28(12.5,4) 29(12.5,4.8) 30(12.5,5.6) 31(12.5,6.4) 32(12.5,7.2) 33(12.5,8) 34(12.5,8.8) 35(12.5,9.6)
  rect 0.5x0.9 smd: 12(1.8,0.7) 13(2.6,0.7) 14(3.4,0.7) 15(4.2,0.7) 16(5,0.7) 17(5.8,0.7) 18(6.6,0.7) 19(7.4,0.7) 20(8.2,0.7) 21(9,0.7) 22(9.8,0.7) 23(10.6,0.7) 24(11.4,0.7) 36(11.4,10.5) 37(10.6,10.5) 38(9.8,10.5) 39(9,10.5) 40(8.2,10.5) 41(7.4,10.5) 42(6.6,10.5) 43(5.8,10.5) 44(5,10.5) 45(4.2,10.5) 46(3.4,10.5) 47(2.6,10.5) 48(1.8,10.5)
  rect 5.4x5.4 smd: 49(6.6,5.6)
  rect 0.8x0.8 smd: 50(12.55,10.55) 51(12.55,0.65) 52(0.65,0.65) 53(0.65,10.55)
FFC_15P_1_MIPI
  rect 0.6x1.85 smd: 1(7,1.875) 2(6,1.875) 3(5,1.875) 4(4,1.875) 5(3,1.875) 6(2,1.875) 7(1,1.875) 8(0,1.875) 9(-1,1.875) 10(-2,1.875) 11(-3,1.875) 12(-4,1.875) 13(-5,1.875) 14(-6,1.875) 15(-7,1.875)
  rect 0.6x1.65 smd: 16(7,-1.875) 17(6,-1.875) 18(5,-1.875) 19(4,-1.875) 20(3,-1.875) 21(2,-1.875) 22(1,-1.875) 23(0,-1.875) 24(-1,-1.875) 25(-2,-1.875) 26(-3,-1.875) 27(-4,-1.875) 28(-5,-1.875) 29(-6,-1.875) 30(-7,-1.875)
HOLE5_3
  round 5 hole 3: 1(0,0)
L2520
  rect 0.85x2 smd: 1(-0.85,0) 2(0.85,0)
LED0603
  rect 0.95x1 smd: 1(0.8,0) 2(-0.8,0)
MIC2_4_B4013AM422-042
  round 0.9 smd: 1(0,0)
  custom 2.7x2.7 smd: 2(0,-1.125)
QFN20_0P4_3
  oval 1x0.25 smd: 1(-1.5,0.8) 2(-1.5,0.4) 3(-1.5,0) 4(-1.5,-0.4) 5(-1.5,-0.8) 11(1.5,-0.8) 12(1.5,-0.4) 13(1.5,0) 14(1.5,0.4) 15(1.5,0.8)
  oval 0.25x1 smd: 6(-0.8,-1.5) 7(-0.4,-1.5) 8(0,-1.5) 9(0.4,-1.5) 10(0.8,-1.5) 16(0.8,1.5) 17(0.4,1.5) 18(0,1.5) 19(-0.4,1.5) 20(-0.8,1.5)
  rect 1.6x1.6 smd: 21(0,0)
QFN32_0P4_4_E2P75
  oval 0.8x0.25 smd: 1(-2,1.4) 2(-2,1) 3(-2,0.6) 4(-2,0.2) 5(-2,-0.2) 6(-2,-0.6) 7(-2,-1) 8(-2,-1.4) 17(2,-1.4) 18(2,-1) 19(2,-0.6) 20(2,-0.2) 21(2,0.2) 22(2,0.6) 23(2,1) 24(2,1.4)
  oval 0.25x0.8 smd: 9(-1.4,-2) 10(-1,-2) 11(-0.6,-2) 12(-0.2,-2) 13(0.2,-2) 14(0.6,-2) 15(1,-2) 16(1.4,-2) 25(1.4,2) 26(1,2) 27(0.6,2) 28(0.2,2) 29(-0.2,2) 30(-0.6,2) 31(-1,2) 32(-1.4,2)
  rect 2.75x2.75 smd: 33(0,0)
QFN104_0P35_10_E7P5_A
  oval 0.65x0.18 smd: 1(-4.925,4.375) 2(-4.925,4.025) 3(-4.925,3.675) 4(-4.925,3.325) 5(-4.925,2.975) 6(-4.925,2.625) 7(-4.925,2.275) 8(-4.925,1.925) 9(-4.925,1.575) 10(-4.925,1.225) 11(-4.925,0.875) 12(-4.925,0.525) 13(-4.925,0.175) 14(-4.925,-0.175) 15(-4.925,-0.525) 16(-4.925,-0.875) 17(-4.925,-1.225) 18(-4.925,-1.575) 19(-4.925,-1.925) 20(-4.925,-2.275) 21(-4.925,-2.625) 22(-4.925,-2.975) 23(-4.925,-3.325) 24(-4.925,-3.675) 25(-4.925,-4.025) 26(-4.925,-4.375) 53(4.925,-4.375) 54(4.925,-4.025) 55(4.925,-3.675) 56(4.925,-3.325) 57(4.925,-2.975) 58(4.925,-2.625) 59(4.925,-2.275) 60(4.925,-1.925) 61(4.925,-1.575) 62(4.925,-1.225) 63(4.925,-0.875) 64(4.925,-0.525) 65(4.925,-0.175) 66(4.925,0.175) 67(4.925,0.525) 68(4.925,0.875) 69(4.925,1.225) 70(4.925,1.575) 71(4.925,1.925) 72(4.925,2.275) 73(4.925,2.625) 74(4.925,2.975) 75(4.925,3.325) 76(4.925,3.675) 77(4.925,4.025) 78(4.925,4.375)
  oval 0.18x0.65 smd: 27(-4.375,-4.925) 28(-4.025,-4.925) 29(-3.675,-4.925) 30(-3.325,-4.925) 31(-2.975,-4.925) 32(-2.625,-4.925) 33(-2.275,-4.925) 34(-1.925,-4.925) 35(-1.575,-4.925) 36(-1.225,-4.925) 37(-0.875,-4.925) 38(-0.525,-4.925) 39(-0.175,-4.925) 40(0.175,-4.925) 41(0.525,-4.925) 42(0.875,-4.925) 43(1.225,-4.925) 44(1.575,-4.925) 45(1.925,-4.925) 46(2.275,-4.925) 47(2.625,-4.925) 48(2.975,-4.925) 49(3.325,-4.925) 50(3.675,-4.925) 51(4.025,-4.925) 52(4.375,-4.925) 79(4.375,4.925) 80(4.025,4.925) 81(3.675,4.925) 82(3.325,4.925) 83(2.975,4.925) 84(2.625,4.925) 85(2.275,4.925) 86(1.925,4.925) 87(1.575,4.925) 88(1.225,4.925) 89(0.875,4.925) 90(0.525,4.925) 91(0.175,4.925) 92(-0.175,4.925) 93(-0.525,4.925) 94(-0.875,4.925) 95(-1.225,4.925) 96(-1.575,4.925) 97(-1.925,4.925) 98(-2.275,4.925) 99(-2.625,4.925) 100(-2.975,4.925) 101(-3.325,4.925) 102(-3.675,4.925) 103(-4.025,4.925) 104(-4.375,4.925)
  rect 7.5x7.5 smd: 105(0,0)
R0201
  rect 0.3x0.3 smd: 1(-0.25,0) 2(0.25,0)
R0402
  rect 0.508x0.508 smd: 1(-0.508,0) 2(0.508,0)
R0603
  rect 0.813x0.914 smd: 1(-0.826,0) 2(0.826,0)
RJ45_HR913129A
  round 3.25 hole 3.25 unplated: (-5.715,0) (5.715,0)
  round 1.5 hole 0.89: 1(4.45,-6.35) 2(3.18,-8.89) 3(1.91,-6.35) 4(0.64,-8.89) 5(-0.63,-6.35) 6(-1.9,-8.89) 7(-3.17,-6.35) 8(-4.44,-8.89)
  round 1.7 hole 1.02: 9(6.625,4.9) 10(4.085,4.9) 11(-4.085,4.9) 12(-6.625,4.9)
  round 2.4 hole 1.63: SHD1(-7.745,-3.05) SHD2(7.745,-3.05)
SOD523
  rect 0.48x0.4 smd: 1(-0.66,0) 2(0.66,0)
SOD882
  rect 0.4x0.7 smd: 1(-0.35,0) 2(0.35,0)
SOT23-3
  rect 1x0.65 smd: 1(-1.15,0.95) 2(-1.15,-0.95) 3(1.15,0)
SOT23-5
  oval 1x0.5 smd: 1(-1.575,0.95) 2(-1.575,0) 3(-1.575,-0.95) 4(1.575,-0.95) 5(1.575,0.95)
SOT23_0P95_2P6
  rect 1.1x0.6 smd: 1(-1.3,0.95) 2(-1.3,0) 3(-1.3,-0.95) 4(1.3,-0.95) 5(1.3,0.95)
SOT-363
  rect 0.7x0.4 smd: 1(-0.85,0.65) 2(-0.85,0) 3(-0.85,-0.65) 4(0.85,-0.65) 5(0.85,0) 6(0.85,0.65)
SS-12D10L3
  round 2.5 hole 1.7: 1(-4.7,0) 2(0,0) 3(4.7,0)
SSOP8_0P65_5
  rect 1.7x0.38 smd: 1(-2.15,0.975) 2(-2.15,0.325) 3(-2.15,-0.325) 4(-2.15,-0.975) 5(2.15,-0.975) 6(2.15,-0.325) 7(2.15,0.325) 8(2.15,0.975)
SW4-4P5X4P5X2P9-SMT
  rect 1.7x1.1 smd: 1(-3.4,1.5) 2(-3.4,-1.5) 3(3.4,-1.5) 4(3.4,1.5)
TF_CARDA
  round 1 hole 1 unplated: (0,-4) (0,4)
  rect 1.4x0.7 smd: 1(-10.6,3.2) 2(-10.6,2.1) 3(-10.6,1) 4(-10.6,-0.1) 5(-10.6,-1.2) 6(-10.6,-2.3) 7(-10.6,-3.4) 8(-10.6,-4.5) 9(-10.6,-5.6)
  rect 1.4x1.6 smd: 10(-10,-7.05) 12(-10,7.8)
  rect 2.2x1.2 smd: 11(-0.4,-6.8) 13(-0.4,8.7)
TPC1
  round 1 smd: 1(0,0)
USB_TYPEC_16P_F
  round 0.6 hole 0.6 unplated: (-2.89,0) (2.89,0)
  rect 0.3x1.14 smd: 1(-3.35,1.07) 2(-3.05,1.07) 3(-2.55,1.07) 4(-2.25,1.07) 5(-1.75,1.07) 6(-1.25,1.07) 7(-0.75,1.07) 8(-0.25,1.07) 9(0.25,1.07) 10(0.75,1.07) 11(1.25,1.07) 12(1.75,1.07) 13(2.25,1.07) 14(2.55,1.07) 15(3.05,1.07) 16(3.35,1.07)
  oval 0.9x1.7 hole 0.6x1.4: 17(-4.325,-3.68) 20(4.325,-3.68)
  oval 0.9x2 hole 0.6x1.7: 18(-4.325,0.5) 19(4.325,0.5)
WSON6X8
  rect 0.61x2.591 smd: 1(-1.905,-3.305) 2(-0.635,-3.305) 3(0.635,-3.305) 4(1.905,-3.305) 5(1.905,3.305) 6(0.635,3.305) 7(-0.635,3.305) 8(-1.905,3.305)
  rect 4.3x3.4 smd: 9(0,0)
XTAL3215
  rect 1x1.5 smd: 1(-1.225,0) 2(1.225,0)
XTAL3225
  rect 1.1x1 smd: 1(-0.9,-0.75) 2(0.9,-0.75) 3(0.9,0.75) 4(-0.9,0.75)

## Nets
A3V3: C31.1 C33.1 R68.2 U5.5(OUT)
AGND: C21.2 C22.2 C23.2 C24.2 C26.2 C27.2 C29.2 C35.1 C36.1 C37.1 C38.2 C41.2 C42.1 C43.2 C57.2 C60.2 C62.2 C63.2 C66.2 C67.1 C77.1 C81.2 J16.3 J16.4 R57.1 R66.2 R99.1 R148.2 U3.5(DGND) U3.10(AGND) U3.21(PAD) U10.7(GND)
AVDD: C35.2 R68.1 U3.11(AVDD)
DVDD: C21.1 C22.1 R51.2 U3.3(PVDD) U3.4(DVDD)
GND: C1.2 C2.2 C7.2 C8.2 C10.2 C14.2 C15.2 C16.2 C18.2 C19.2 C20.2 C25.2 C28.2 C30.2 C31.2 C33.2 C44.2 C45.2 C46.2 C47.2 C48.2 C49.2 C50.2 C51.2 C54.2 C55.2 C56.2 C61.2 C64.2 C65.2 C68.2 C70.2 C71.2 C72.2 C73.2 C74.2 C75.2 C76.2 C79.2 C80.2 C82.2 C83.2 C84.2 C85.2 C86.2 C87.2 C88.2 C89.2 C90.2 C91.2 C92.2 C93.2 C94.2 C95.2 C96.2 C97.2 C98.2 C99.2 C100.2 C101.2 C102.2 C103.2 C104.2 C105.2 C107.2 C108.2 C109.2 C110.2 C111.2 C112.2 C113.2 C114.2 C115.2 C116.2 C117.2 C118.2 D3.1 D4.1 D5.1 D6.1 D7.1 D8.1 D10.1 D11.1 D12.2(CATHODE) D13.1 D14.1 D15.1 D16.1 D17.1 D18.1 D19.1 D20.1 D21.1 D22.1 D23.1 D24.1 H1.1 H2.1 H3.1 H4.1 J1.6 J1.9 J1.14 J1.20 J1.25 J1.30 J1.34 J1.39 J2.4 J5.1(GND#1) J5.4(GND#4) J5.7(GND#7) J5.10(GND#10) J5.13(GND#13) J9.1(GND#1) J9.4(GND#4) J9.7(GND#7) J9.10(GND#10) J15.1(A1_G) J15.2(B12_G) J15.15(B1_G) J15.16(A12_G) J17.8(GND) J18.4(GND#4) J19.1(A1_G) J19.2(B12_G) J19.15(B1_G) J19.16(A12_G) J20.1(A1_G) J20.2(B12_G) J20.15(B1_G) J20.16(A12_G) J21.6(VSS) J21.10(G1) J21.11(G2) J21.12(G3) J21.13(G4) R99.2 R138.2 R140.1 R152.1 R153.2 R154.2 R156.2 R165.2 R166.2 R169.2 R170.2 R176.1 R177.1 R180.1 R181.2 R182.1 R183.1 R184.1 R185.1 R186.1 R187.2 R202.2 R203.2 R216.1 R217.1 R223.2 R224.1 R225.1 R229.1 R234.2 SW1.1 SW2.1 TP1.1 TP3.1 TP12.1 U1.1(GND#1) U1.2(GND#2) U1.11(GND#11) U1.14(GND#14) U1.36(GND#36) U1.37(GND#37) U1.38(GND#38) U1.39(GND#39) U1.40(GND#40) U1.41(GND#41) U1.42(GND#42) U1.43(GND#43) U1.44(GND#44) U1.45(GND#45) U1.46(GND#46) U1.47(GND#47) U1.48(GND#48) U1.49(EPAD) U1.50(GND#50) U1.51(GND#51) U1.52(GND#52) U1.53(GND#53) U2.4(GND) U2.9(EPAD) U4.105(GND) U5.2(GND) U7.2(GND) U8.33(E-PAD) U9.2(GND) U11.2(GND) Y2.2(GND#2) Y2.4(GND#4) Y3.2(GND#2) Y3.4(GND#4)
GND_EARTH: J15.17(E_G1) J15.18(E_G2) J15.19(E_G3) J15.20(E_G4) J18.5(GND#5) J18.6(GND#6) J19.17(E_G1) J19.18(E_G2) J19.19(E_G3) J19.20(E_G4) J20.17(E_G1) J20.18(E_G2) J20.19(E_G3) J20.20(E_G4) R187.1
GND_RJ45_EARTH: J17.SHD1 J17.SHD2 R181.1
VBUS_EN: R145.2 R152.2 U9.4(EN)
VBUS_OUT: C72.1 C73.1 C74.1 C75.1 D15.2 J18.1(VBUS) U9.1(OUT)
VCC_5V: C48.1 C49.1 C65.1 C71.1 J1.2 J1.4 R145.1 R151.1 R171.2 R173.1 R175.2 R226.2 SW3.1 U5.1(VIN) U9.5(IN) U11.4(VIN)
VDD_FLASH: C16.1 C20.1 C25.1 R18.2 R35.2 R37.2 U2.8(VCC) U4.30(VDD_FLASHIO)
25M_XI: R161.1 U8.2(X1)
25M_XO: R158.1 U8.3(X2)
ADCVREF: C43.1 R73.2 U3.15(ADCVREF)
BAT: R196.1 TP2.1
C6_EN: C8.1 J2.1 R4.1 R76.2 U1.8(EN)
C6_IO8: R10.1 U1.22(IO8)
C6_IO9: J2.6 U1.23(IO9)
C6_U0RXD: J2.5 U1.30(RXD0)
C6_U0TXD: J2.3 U1.31(TXD0)
C6_WAKEUP: R30.2 U1.5(IO2)
CNN_GPIO0: J1.23 R199.1
CNN_GPIO1: J1.22 R197.1
CNN_GPIO2: J1.21 R22.1
CNN_GPIO3: J1.19 R48.1
CNN_GPIO4: J1.18 R31.1
CNN_GPIO5: J1.16 R47.1
CNN_GPIO6: J1.15 R29.1
CNN_GPIO7: J1.3 R46.1
CNN_GPIO8: J1.5 R28.1
CNN_GPIO20: J1.13 R33.1
CNN_GPIO21: J1.11 R39.1
CNN_GPIO22: J1.12 R32.1
CNN_GPIO23: J1.7 R38.1
CNN_GPIO26: J1.31 R228.2
CNN_GPIO27: J1.38 R227.2
CNN_GPIO32: J1.26 R116.2
CNN_GPIO33: J1.29 R134.2
CNN_GPIO36: J1.24 R112.2
CNN_GPIO37: J1.8 R136.2
CNN_GPIO38: J1.10 R118.2
CNN_GPIO45: J1.40 R100.2
CNN_GPIO46: J1.36 R97.2
CNN_GPIO47: J1.37 R94.2
CNN_GPIO48: J1.33 R93.2
CNN_GPIO53: J1.35 R85.1
CNN_GPIO54: J1.32 R80.1
CODEC_CE: R57.2 R60.1 U3.20(CE)
COL: R149.2 R153.1 U8.4(COL/RMII)
CRS: R154.1 R155.2 U8.20(CRS/LEDMOD)
CSI_A_CLKN: J9.8(CLK_CN) R86.2
CSI_A_CLKP: J9.9(CLK_CP) R82.2
CSI_A_DATA0N: J9.2(DN0) R78.2
CSI_A_DATA0P: J9.3(DP0) R81.2
CSI_A_DATA1N: J9.5(DN1) R88.2
CSI_A_DATA1P: J9.6(DP1) R90.2
CSI_CLKN: R86.1 U4.45(CSI_CLKN)
CSI_CLKP: R82.1 U4.44(CSI_CLKP)
CSI_DATA0N: R78.1 U4.42(CSI_DATAN0)
CSI_DATA0P: R81.1 U4.43(CSI_DATAP0)
CSI_DATA1N: R88.1 U4.46(CSI_DATAN1)
CSI_DATA1P: R90.1 U4.47(CSI_DATAP1)
CSI_IO0: J9.11(CAM_IO0) R123.2
CSI_IO1: J9.12(CAM_IO1) R111.2
CSI_REXT: R203.1 U4.48(CSI_REXT)
DACVREF: C42.2 U3.14(DACVREF)
DSI_A_CLKN: J5.5(CLK_CN) R72.1
DSI_A_CLKP: J5.6(CLK_CP) R74.1
DSI_A_DATA0N: J5.8(DN0) R77.1
DSI_A_DATA0P: J5.9(DP0) R75.1
DSI_A_DATA1N: J5.2(DN1) R71.1
DSI_A_DATA1P: J5.3(DP1) R69.1
DSI_CLKN: R72.2 U4.37(DSI_CLKN)
DSI_CLKP: R74.2 U4.38(DSI_CLKP)
DSI_DATA0N: R77.2 U4.40(DSI_DATAN0)
DSI_DATA0P: R75.2 U4.39(DSI_DATAP0)
DSI_DATA1N: R71.2 U4.36(DSI_DATAN1)
DSI_DATA1P: R69.2 U4.35(DSI_DATAP1)
DSI_REXT: R202.1 U4.34(DSI_REXT)
EN_DCDC: U4.79(EN_DCDC) U7.1(EN/PG)
ESP_3V3: C1.1 C2.1 C7.1 C10.1 C46.1 C47.1 C83.1 C85.1 C87.1 C88.1 C90.1 C95.1 C96.1 C97.1 C103.1 J1.1 J1.17 J5.14(3V3#14) J5.15(3V3#15) J9.15(3V3) Q8.2(S) R1.1 R3.1 R4.2 R5.1 R6.1 R10.2 R11.1 R12.1 R35.1 R51.1 R60.2 R98.1 R109.1 R111.1 R123.1 R127.1 R174.2 R198.1 R208.2 R209.2 R213.1 R230.2 R233.2 U1.3(3V3) U4.9(VDD_LP) U4.21(VDD_IO_0) U4.62(VDD_IO_4) U4.75(VDD_LDO) U4.77(VDD_DCDCC) U4.96(VDD_IO_6) U4.101(VDD_ANA)
ESP_EN: C30.1 R200.2 SW1.3 TP23.1 U4.103(CHIP_PU)
ESP_I2C_SCL: R9.1 R52.1 R106.1 R109.2 R190.1
ESP_I2C_SDA: R8.1 R62.1 R98.2 R101.1 R194.1
ESP_LDO_VO1: C56.1 R37.1 TP26.1 U4.71(VDDO_FLASH)
ESP_LDO_VO2: C50.1 C104.1 C105.1 TP24.1 U4.59(VDD_PSRAM_0) U4.67(VDD_PSRAM_1) U4.72(VDDO_PSRAM)
ESP_LDO_VO3: C55.1 C91.1 C92.1 C93.1 TP27.1 U4.41(VDD_MIPI_DPHY) U4.73(VDDO_3)
ESP_LDO_VO4: C51.1 C101.1 C102.1 R17.1 R19.1 R21.1 R34.1 R36.1 TP25.1 U4.74(VDDO_4) U4.85(VDD_IO_5)
ESP_VBAT: C82.1 C84.1 R196.2 R198.2 R200.1 U4.102(VDD_BAT)
ESP_VDD_HP: C53.1 C61.1 C86.1 C89.1 C94.1 C107.1 L1.2 R128.1 R232.2 U4.26(VDD_HP_0) U4.76(VDD_HP_2) U4.91(VDD_HP_3)
FB_DCDC: C53.2 R128.2 R138.1 U4.78(FB_DCDC) U7.5(FB)
FLASH_CK: R49.2 U4.32(FLASH_CK)
FLASH_CK_A: R49.1 U2.6(CLK)
FLASH_CS: R56.2 U4.27(FLASH_CS)
FLASH_CS_A: R18.1 R56.1 U2.1(/CS)
FLASH_D: R53.2 U4.33(FLASH_D)
FLASH_D_A: R53.1 U2.5(DI)
FLASH_HD: R54.2 U4.31(FLASH_HOLD)
FLASH_HD_A: R54.1 U2.7(/HOLD)
FLASH_Q: R50.2 U4.28(FLASH_Q)
FLASH_Q_A: R50.1 U2.2(DO)
FLASH_WP: R55.2 U4.29(FLASH_WP)
FLASH_WP_A: R55.1 U2.3(/WP)
GPIO0: R61.1 R199.2 U4.104(GPIO0)
GPIO1: R59.1 R197.2 U4.1(GPIO1)
GPIO2: R22.2 U4.2(GPIO2)
GPIO3: R48.2 U4.3(GPIO3)
GPIO4: R31.2 U4.4(GPIO4)
GPIO5: R47.2 U4.5(GPIO5)
GPIO6: R29.2 R30.1 U4.6(GPIO6)
GPIO7: R46.2 R194.2 U4.7(GPIO7)
GPIO8: R28.2 R190.2 U4.8(GPIO8)
GPIO9: R45.2 U4.10(GPIO9)
GPIO10: R27.2 U4.11(GPIO10)
GPIO11: R44.2 U4.12(GPIO11)
GPIO12: R26.2 U4.13(GPIO12)
GPIO13: R43.2 U4.14(GPIO13)
GPIO14: R25.2 U4.15(GPIO14)
GPIO15: R42.2 U4.16(GPIO15)
GPIO16: R24.2 U4.17(GPIO16)
GPIO17: R41.2 U4.18(GPIO17)
GPIO18: R23.2 U4.19(GPIO18)
GPIO19: R40.2 U4.20(GPIO19)
GPIO20: R33.2 U4.22(GPIO20)
GPIO21: R39.2 U4.23(GPIO21)
GPIO22: R32.2 U4.24(GPIO22)
GPIO23: R38.2 U4.25(GPIO23)
GPIO24: R104.1 U4.52(GPIO24)
GPIO25: R105.1 U4.53(GPIO25)
GPIO26: R113.1 R228.1 U4.55(GPIO26)
GPIO27: R131.1 R227.1 U4.56(GPIO27)
GPIO28: R114.1 U4.57(GPIO28)
GPIO29: R132.1 U4.58(GPIO29)
GPIO30: R115.1 U4.60(GPIO30)
GPIO31: R133.1 U4.61(GPIO31)
GPIO32: R116.1 U4.63(GPIO32)
GPIO33: R134.1 U4.64(GPIO33)
GPIO34: R117.1 R205.2 U4.65(GPIO34)
GPIO34_BOOTMODE: R205.1 TP34.1
GPIO35: R135.1 R207.1 U4.66(GPIO35)
GPIO35_BOOTMODE: C44.1 R207.2 R208.1 SW2.3 TP22.1
GPIO36: R112.1 R204.1 U4.68(GPIO36)
GPIO36_BOOTMODE: R204.2 R209.1 TP33.1
GPIO37: R136.1 R212.1 U4.69(GPIO37)
GPIO37_BOOTMODE: R212.2 TP36.1
GPIO38: R118.1 R206.1 U4.70(GPIO38)
GPIO38_BOOTMODE: R206.2 TP35.1
GPIO39: R122.1 U4.80(GPIO39)
GPIO40: R110.1 U4.81(GPIO40)
GPIO41: R108.1 U4.82(GPIO41)
GPIO42: R107.1 U4.83(GPIO42)
GPIO43: R103.1 U4.84(GPIO43)
GPIO44: R102.1 U4.86(GPIO44)
GPIO45: R100.1 R231.1 U4.87(GPIO45)
GPIO46: R97.1 U4.88(GPIO46)
GPIO47: R94.1 U4.89(GPIO47)
GPIO48: R93.1 U4.90(GPIO48)
GPIO49: R92.1 U4.92(GPIO49)
GPIO50: R91.1 U4.93(GPIO50)
GPIO51: R89.1 U4.94(GPIO51)
GPIO52: R87.1 U4.95(GPIO52)
GPIO53: R79.1 R85.2 U4.97(GPIO53)
GPIO54: R76.1 R80.2 U4.98(GPIO54)
I2S_ASDOUT: R44.1 U3.7(ASDOUT)
I2S_DSDIN: R45.1 U3.9(DSDIN)
I2S_LRCK: C29.1 R27.1 U3.8(LRCK)
I2S_MCLK: C23.1 R43.1 U3.2(MCLK)
I2S_SCLK: C26.1 R26.1 U3.6(SCLK/DMIC_SCL)
MDC: R133.2 R160.2 U8.22(MDC)
MDIO: R87.2 R163.2 U8.23(MDIO)
MICN: C34.1 R64.2 R65.1
MICP: C32.1 J7.1(+) R63.1 TP11.1
OUTN: C57.1 C58.1 R84.2
OUTP: C59.1 C60.1 R83.2
PA_CTRL: R79.2 R148.1 U10.1(CTRL)
PA_INL+: R147.2 U10.3(IN+)
PA_INL-: R146.2 U10.4(IN-)
PA_OUTL+: L3.2 U10.8(OUT+)
PA_OUTL-: L2.2 U10.5(OUT-)
PA_PVDD1: C63.1 C66.1 C67.2 R171.1 U10.6(VCC)
PHY_3V3: C108.1 C109.1 C112.1 C114.1 J17.12(YLED+) R141.1 R149.1 R155.1 R157.1 R160.1 R163.1 R164.1 R167.1 R168.1 R213.2 U8.13(VDD_IO) U8.31(AVDD33)
PHY_AD0: R141.2 R222.2 U8.11(LED0/PHY_AD0)
PHY_AD3: J17.9(GLED+) R140.2 U8.12(LED3/PHY_AD3)
PHY_ISET: R165.1 U8.25(ISET)
PHY_RSTN: R89.2 R166.1 R167.2 U8.32(RESET_N)
PHY_TESTON: R164.2 U8.24(TEST_ON)
RD+: J17.3(RXD+) U8.27(MDI_RP)
RD-: J17.6(RXD-) U8.26(MDI_RN)
RMII_CLK: R91.2 R139.1 R142.1
RMII_RXD0: R132.2 R144.1
RMII_RXD1: R115.2 R143.1
RMII_RXDV: R114.2 R150.1
RMII_TXD0: R117.2 U8.9(TXD0)
RMII_TXD1: R135.2 U8.8(TXD1)
RMII_TXEN: R92.2 U8.5(TXEN)
RXER: R156.1 R157.2 U8.21(RXER/INTR_32)
SD1_CLK: D6.2 J21.5(CLK) R103.2 TP15.1
SD1_CMD: D4.2 J21.3(CMD) R17.2 R102.2 TP14.1
SD1_D0: D11.2 J21.7(DATA0) R36.2 R122.2 TP19.1
SD1_D1: D10.2 J21.8(DATA1) R34.2 R110.2 TP18.1
SD1_D2: D8.2 J21.1(DATA2) R21.2 R108.2 TP17.1
SD1_D3: D7.2 J21.2(CD/DATA3) R19.2 R107.2 TP16.1
SD1_VDD: C14.1 C15.1 D3.2 J21.4(VDD) Q8.3(D) R16.1 TP13.1
SD2_CLK: R12.2 R23.1 TP5.1 U1.25(IO19)
SD2_CMD: R11.2 R40.1 TP4.1 U1.24(IO18)
SD2_D0: R6.2 R25.1 TP9.1 U1.26(IO20)
SD2_D1: R5.2 R42.1 TP8.1 U1.27(IO21)
SD2_D2: R3.2 R24.1 TP7.1 U1.28(IO22)
SD2_D3: R1.2 R41.1 TP6.1 U1.29(IO23)
SD_DET: D5.2 J21.9(CD) R16.2 TP10.1
SD_PWRN: Q8.1(G) R229.2 R230.1 R231.2
TD+: J17.1(TXD+) U8.30(MDI_TP)
TD-: J17.2(TXD-) U8.29(MDI_TN)
TXER: R168.2 R169.1 U8.1(TXER/FXSD)
USB0_5V: C76.1 D20.2 J20.3(A4_VBUS) J20.4(B9_VBUS) J20.13(B4_VBUS) J20.14(A9_VBUS) Q2.1(1E) Q3.3(D)
USB1_5V: C117.1 D19.2 J19.3(A4_VBUS) J19.4(B9_VBUS) J19.13(B4_VBUS) J19.14(A9_VBUS) Q6.1(1E) Q7.3(D)
USB1P1_N: D17.2 J19.7(B7_DN2) J19.9(A7_DN1) R104.2
USB1P1_N_2: D24.2 J20.7(B7_DN2) J20.9(A7_DN1) R113.2
USB1P1_P: D18.2 J19.8(A6_DP1) J19.10(B6_DP2) R105.2
USB1P1_P_2: D23.2 J20.8(A6_DP1) J20.10(B6_DP2) R131.2
USB2_5V: C110.1 D13.2 J15.3(A4_VBUS) J15.4(B9_VBUS) J15.13(B4_VBUS) J15.14(A9_VBUS) Q4.3(D) Q5.1(1E)
USB_5V: C79.1 C80.1 Q2.4 Q3.2(S) Q4.2(S) Q5.4 Q6.4 Q7.2(S) SW3.2
USB_DM: R221.2 U4.49(DM)
USB_DM_A: D22.2 J18.2(D-) R178.2 R221.1
USB_DM_C: D14.2 J15.7(B7_DN2) J15.9(A7_DN1) R178.1
USB_DP: R220.2 R234.1 U4.50(DP)
USB_DP_A: D21.2 J18.3(D+) R179.2 R220.1
USB_DP_C: D16.2 J15.8(A6_DP1) J15.10(B6_DP2) R179.1
VMID: C37.2 U3.16(VMID)
XTAL_N: R70.1 U4.99(XTAL_N)
XTAL_P: R67.1 U4.100(XTAL_P)
N16934509: C28.1 R67.2 Y2.1(XIN)
N16934523: C45.1 R70.2 Y2.3(XOUT)
N17578381: D12.1(ANODE) R175.1
N18064827: C98.1 C99.1 C100.1 R233.1 U4.51(VDD_USBPHY)
N18110516: C19.1 R58.1 R61.2 Y1.2
N18110531: C18.1 R58.2 R59.2 Y1.1
N18193754: C54.1 R127.2 U7.4(VIN)
N18193822: L1.1 U7.3(SW)
N18248775: R151.2 TP28.1 U9.3(FLG)
N18251395: Q6.2 Q6.5 Q6.6 R224.2
N18251818: Q6.3 Q7.1(G) R225.2
N18253640: Q5.2 Q5.5 Q5.6 R217.2
N18253683: Q4.1(G) Q5.3 R216.2
N18255493: J15.6(A5_CC1) R180.2
N18255499: J15.12(B5_CC2) R182.2
N18256275: J19.6(A5_CC1) R184.2
N18256281: J19.12(B5_CC2) R183.2
N18262730: C69.2 R170.1 R172.2 U11.5(FB)
N18262736: C69.1 C70.1 L4.2 R172.1 R174.1 TP30.1
N18262777: R173.2 U11.1(EN/PG)
N18262785: L4.1 U11.3(SW)
N18266990: C115.1 J17.4(TXCT)
N18266994: C116.1 J17.5(RXCT)
N18267072: J17.10(GLED-) R223.1
N18267076: J17.11(YLED-) R222.1
N18267340: R143.2 U8.17(RXD1)
N18267342: R144.2 U8.18(RXD0)
N18267344: R150.2 U8.19(RXDV/CRS_DV/FX_HEN)
N18267350: R139.2 U8.14(RXCLK/50M_CLKO)
N18267444: C111.1 C113.1 U8.28(REGOUT)
N18267472: R142.2 U8.10(TXCLK/50M_CLKI)
N18299901: C32.2 U3.18(MIC1P/DMIC_SDA)
N18299903: C34.2 U3.17(MIC1N)
N18300035: C24.1 R52.2 U3.1(CCLK)
N18300076: C27.1 R62.2 U3.19(CDATA)
N18300564: J7.2(-) R64.1 R66.1 TP20.1
N18300580: C36.2 R63.2 R65.2 R73.1
N18302373: C40.2 C41.1 U3.13(OUTN)
N18302385: C38.1 C39.2 U3.12(OUTP)
N18302434: C40.1 R84.1
N18302436: C39.1 R83.1
N18379689: C64.1 R158.2 R159.1 Y3.1(XIN)
N18379734: C68.1 R159.2 R161.2 Y3.3(XOUT)
N18399134: Q2.2 Q2.5 Q2.6 R176.2
N18399180: Q2.3 Q3.1(G) R177.2
N18405255: J20.6(A5_CC1) R185.2
N18405261: J20.12(B5_CC2) R186.2
N18412230: J5.11(SCL0) R9.2
N18412242: J5.12(SDA0) R8.2
N18422156: C62.1 U10.2(BYPASS)
N18423897: C77.2 C78.2 J16.1 L3.1 TP32.1
N18423915: C78.1 C81.1 J16.2 L2.1 TP31.1
N18424033: C59.2 R147.1
N18424043: C58.2 R146.1
N18497724: J9.13(SCL0) R106.2
N18497727: J9.14(SDA0) R101.2
N18604768: R226.1 U5.3(EN)
N18792940: C118.1 R232.1 U4.54(VDD_HP_1)

Pads without a net: J1 27 28; J2 2; J5 16 17 18 19 20 21 22 23 24 25 26 27 28 29 30; J9 16 17 18 19 20 21 22 23 24 25 26 27 28 29 30; J15 5 11; J17 7; J19 5 11; J20 5 11; SW1 2 4; SW2 2 4; SW3 3; U1 4 6 7 9 10 12 13 15 16 17 18 19 20 21 32 33 34 35; U5 4; U8 6 7 15 16

## Via types
v1: diameter 0.508, hole 0.254, TOP to BOTTOM, 1247 vias

## Routing (per net, layer and track width the routed paths; a pad name or vN(x,y) marks a point on that pad's centre or on a via; arc(x,y) is an arc through that point)
A3V3: length 17.5
  TOP w0.381: U5.5 50.83,46.54 51.58,47.28 53.53,47.28 C33.1 55.32,46.78 C31.1 57.2,46.76 v1(57.22,46.78) ; v1(66.51,47.42) R68.2
  BOTTOM w0.381: v1(66.51,47.42) 65.88,46.78 v1(57.22,46.78)
AGND:
  vias: v1(50.84,57.25) v1(50.8,55.04) v1(51.68,53.55) v1(52.9,58.54) v1(53.65,53.95) v1(54.79,52.5) v1(54.99,54.6) v1(55.08,57.44) v1(55.95,56.02) v1(56.02,51.17) v1(56.26,58.56) v1(56.73,47.36) v1(56.78,49.93) v1(56.76,45.18) v1(56.76,43.3) v1(56.8,40.29) v1(56.89,38.83) v1(57.53,53.71) v1(57.5,49.93) v1(57.57,46.18) v1(57.7,56.99) v1(58.21,49.93) v1(58.63,52.48) v1(58.82,51.16) v1(58.77,40.58) v1(59.41,41.94) v1(59.46,58.17) v1(59.87,44.01) v1(60.21,47.36) v1(60.26,41.94) v1(60.4,45.2) v1(60.46,54.41) v1(60.62,58.59) v1(61.04,56.4) v1(61.13,52.64) v1(61.13,51.84) v1(61.7,46.18) v1(62.11,57.53) v1(62.07,55.44) v1(62.09,41.95) v1(62.44,46.18) v1(62.64,38.85) v1(62.8,42.62) v1(63.05,56.54) v1(63.36,47.36) v1(63.48,49.76) v1(63.87,58.63) v1(64.15,50.04) v1(64.33,52.85) v1(64.61,41.2) v1(64.86,47.36) v1(65.34,56.19) v1(65.32,51.86) v1(65.32,50.94) v1(65.32,42.92) v1(65.33,42.07) v1(65.51,38.89) v1(66.18,51.86) v1(66.21,50.94) v1(66.27,56.25) v1(66.46,48.12) v1(66.65,58.63) v1(66.7,46.73) v1(66.97,49.24) v1(67.02,44.72) v1(67.02,43.69) v1(67.15,40.33) v1(67.42,52.9) v1(67.97,56.16) v1(68,41.28) v1(68.09,45.02) v1(68.35,49.38) v1(68.37,42.78) v1(68.48,46.85) v1(68.77,45.05) v1(68.86,48.2) v1(69.6,55.6) v1(69.82,42.94) v1(70.04,54.18) v1(70.07,48.25) v1(70.72,52.54) v1(70.7,51.64) v1(70.73,48.95) v1(70.7,46.32) v1(70.77,53.44) v1(71.25,44.55) v1(72.74,46.35) v1(72.74,42.89) v1(73.17,53.81) v1(73.24,48.16) v1(73.26,50.29) v1(74.41,42.93) v1(74.63,52.05) v1(75.54,49) v1(75.49,45.2) v1(76.29,53.8) v1(76.48,50.12) v1(76.55,44.96) v1(77.22,50.74) v1(77.22,44.34) v1(77.91,50.06) v1(77.88,44.95) v1(78.35,42.99) v1(79.45,53.84) v1(79.48,52.02) v1(80.81,45.32) v1(81.05,49.67) v1(82.13,53.79) v1(82.1,47.54) v1(82.39,42.99) v1(82.85,50.7) v1(82.88,44.41) v1(84.01,45.62) v1(84.1,52.66) v1(84.43,49.51) v1(84.76,42.95) v1(86.99,52.03) v1(87.14,49.37) v1(87.11,45.67) v1(87.06,43.01)
AVDD: length 3.5
  TOP w0.254: 67.73,50.1 67.73,50.35 67.48,50.6 U3.11
  TOP w0.381: 67.73,50.1 67.73,49.14 68.03,48.83 C35.2 R68.1
DVDD: length 4.3
  TOP w0.254: U3.4 63.74,51 63.56,51.17 63.79,51.4 U3.3
  TOP w0.381: R51.2 C21.1 C22.1 63.21,51.17 63.56,51.17
GND: length 210.7
  TOP w0.127: 25.16,9.36 v1(25.16,9.92) ; 26.64,9.36 v1(26.64,9.92)
  TOP w0.254: J15.1 22.07,7.03 22.22,7.18 22.37,7.03 J15.2 ; J19.15 43.51,7.16 43.63,7.28 43.81,7.1 J19.16 ; J20.1 52.15,7.11 52.29,7.25 52.45,7.1 J20.2 ; J20.16 58.85,7.2 58.69,7.36 58.55,7.21 J20.15 ; J19.1 37.11,7.06 37.25,7.21 37.41,7.05 J19.2 ; J15.15 28.47,7.15 28.59,7.28 28.77,7.11 J15.16
  TOP w0.508: v1(43.63,7.71) 43.63,7.28 ; 52.29,7.25 52.29,7.38 v1(51.86,7.81) ; 22.22,7.18 22.22,7.48 v1(21.99,7.71) ; 37.25,7.21 37.25,7.41 v1(36.92,7.74) ; v1(58.69,7.69) 58.69,7.36 ; v1(28.59,7.71) 28.59,7.28
  TOP w0.635: H2.1 64.33,70.5 ; H2.1 61.5,67.67 ; H2.1 58.67,70.5 ; J18.4 13.48,13.33 ; J18.4 14.47,12.34 ; J18.4 13.48,11.35 ; J18.4 12.49,12.34 ; 77.97,16.59 J17.8 ; J17.8 77.97,18.75 ; J17.8 79.05,17.67 ; J17.8 76.89,17.67 ; 61.5,18.67 H4.1 ; H4.1 64.33,21.5 ; H4.1 61.5,24.33 ; H4.1 58.67,21.5 ; 3.5,18.67 H3.1 ; H3.1 6.33,21.5 ; H3.1 3.5,24.33 ; 56.63,68.01 J1.39 57.85,69.23 ; 6.33,70.5 H1.1 3.5,67.67
  GND w0.635: 48.31,73.08 49.01,72.38 49.01,72.2 ; 70.18,69.65 J2.4 70.06,67.53 ; 3.5,67.67 H1.1 6.33,70.5 ; 31.23,72.19 31.23,72.28 31.99,73.04 ; 31.23,72.19 30.41,73.02 ; 31.23,72.19 J1.20 ; 37.77,68.15 J1.25 40.05,68.03 ; 19.59,68.17 J1.9 17.39,68.09 ; 61.5,67.67 H2.1 ; H2.1 58.67,70.5 ; H2.1 64.33,70.5 ; 23.61,71.96 22.61,72.96 ; 23.61,71.96 J1.14 ; 23.61,71.96 23.61,72.17 24.43,72.99 ; H4.1 61.5,24.33 ; H4.1 64.33,21.5 ; H4.1 58.67,21.5 ; H4.1 61.5,18.67 ; 12.49,12.34 J18.4 ; J18.4 13.48,13.33 ; J18.4 14.47,12.34 ; J18.4 13.48,11.35 ; 57.85,69.23 J1.39 56.63,68.01 ; 49.81,73 49.01,72.2 ; 49.01,72.2 J1.34 ; 42.95,73.02 43.93,72.04 ; 43.93,72.04 43.93,72.19 44.67,72.93 ; 43.93,72.04 J1.30 ; 3.5,18.67 H3.1 ; H3.1 3.5,24.33 ; H3.1 6.33,21.5 ; J17.8 79.05,17.67 ; J17.8 77.97,18.75 ; J17.8 77.97,16.59 ; J17.8 76.89,17.67 ; 12.31,72.96 13.45,71.82 ; 13.45,71.82 J1.6 ; 13.45,71.82 13.45,72.17 14.34,73.07
  POWER w0.635: J18.4 14.47,12.34 ; J18.4 13.48,13.33 ; J18.4 12.49,12.34 ; J18.4 13.48,11.35 ; 61.5,18.67 H4.1 ; H4.1 64.33,21.5 ; H4.1 58.67,21.5 ; 57.85,69.23 J1.39 56.63,68.01 ; J17.8 77.97,18.75 ; J17.8 76.89,17.67 ; J17.8 79.05,17.67 ; J17.8 77.97,16.59 ; H3.1 6.33,21.5 ; H3.1 3.5,24.33 ; H3.1 3.5,18.67 ; H2.1 64.33,70.5 ; H2.1 58.67,70.5 ; H2.1 61.5,67.67
  BOTTOM w0.127: D8.1 70.81,30.9 v1(71.09,30.62) ; D7.1 70.4,32.94 v1(70.25,33.09) ; D6.1 70.35,36.9 v1(70.3,36.85) ; v1(70.32,39.46) 70.4,39.39 D10.1 ; D4.1 v1(70.27,34.18) ; D3.1 v1(70.27,35.43) ; v1(70.32,38.06) 70.4,38.14 D11.1
  BOTTOM w0.635: 57.85,69.23 J1.39 56.63,68.01 ; 13.48,11.21 J18.4 ; J18.4 14.61,12.34 ; J18.4 13.48,13.47 ; J18.4 12.35,12.34 ; 58.67,21.5 H4.1 ; H4.1 61.5,24.33 ; H4.1 61.5,18.67 ; H4.1 64.33,21.5 ; 76.89,17.67 J17.8 ; J17.8 77.97,16.59 ; J17.8 77.97,18.75 ; J17.8 79.05,17.67 ; H2.1 64.33,70.5 ; H2.1 61.5,67.67 ; H2.1 58.67,70.5 ; H3.1 6.33,21.5 ; H3.1 3.5,18.67 ; H3.1 3.5,24.33 ; 3.5,67.67 H1.1 6.33,70.5
  vias: v1(0.84,68.8) v1(0.84,65.8) v1(0.78,62.32) v1(0.78,46.74) v1(0.78,40.9) v1(0.78,36.49) v1(0.8,31.89) v1(0.85,27.73) v1(0.89,23.59) v1(0.87,19.71) v1(0.87,16.35) v1(0.85,13.08) v1(2.21,41.23) v1(2.16,37.06) v1(2.23,32.73) v1(2.37,62.4) v1(2.78,45.33) v1(2.94,42.79) v1(2.98,57.5) v1(3.27,16.73) v1(3.39,65.76) v1(3.42,54.73) v1(3.41,52.58) v1(3.74,14.49) v1(3.89,15.47) v1(4.06,59.5) v1(4.11,56.52) v1(4.12,53.38) v1(4.14,47.51) v1(4.09,17.76) v1(4.15,50.52) v1(4.19,35.45) v1(4.17,28.37) v1(4.32,45.85) v1(4.63,12.87) v1(5.05,38.42) v1(5.57,64.96) v1(5.64,41.61) v1(5.88,39.87) v1(5.95,34.81) v1(5.93,28.93) v1(6.09,68.46) v1(6.29,73.03) v1(6.54,25.23) v1(6.58,62.5) v1(6.58,18.41) v1(6.73,59.53) v1(6.73,53.43) v1(6.73,50.51) v1(6.73,47.5) v1(6.92,56.04) v1(6.89,21.42) v1(6.91,10.52) v1(6.98,43.21) v1(7.22,41.09) v1(7.28,45.86) v1(7.54,53.99) v1(7.47,51.98) v1(7.5,49.76) v1(7.52,48.29) v1(7.48,44.64) v1(7.56,16.32) v1(7.69,67.74) v1(7.94,55.72) v1(8.49,13.57) v1(8.63,27.71) v1(8.55,15.03) v1(8.74,17.74) v1(8.96,41.7) v1(9.11,19.76) v1(9.24,60.34) v1(9.19,45.88) v1(9.16,44.86) v1(9.31,63.17) v1(9.36,48.63) v1(9.45,61.37) v1(9.6,73.15) v1(9.55,65.1) v1(9.74,68.23) v1(9.78,59.3) v1(9.82,35.22) v1(9.8,32.22) v1(9.82,29.24) v1(9.78,26.22) v1(9.9,43.42) v1(9.92,22.57) v1(10.01,56.68) v1(9.99,11.29) v1(10.1,53.95) v1(10.16,62.29) v1(10.3,44.86) v1(10.77,19.79) v1(11.2,49.41) v1(11.19,23.66) v1(11.2,21.43) v1(11.22,17.25) v1(11.45,58.97) v1(11.43,15.08) v1(11.59,52.5) v1(11.59,46.93) v1(11.57,13.5) v1(11.94,66.18) v1(12.13,55.96) v1(12.16,44.26) v1(12.25,22.53) v1(12.45,60.62) v1(12.4,41.99) v1(12.39,35.22) v1(12.44,29.25) v1(12.41,26.23) v1(12.39,20.21) v1(12.46,40.26) v1(12.47,38.51) v1(12.56,31.52) v1(12.83,10.56) v1(12.86,62.68) v1(12.99,59.85) v1(13.05,53.61) v1(13,18.78) v1(13.11,67.77) v1(13.12,51.65) v1(13.1,49.76) v1(13.2,45.3) v1(13.44,47.18) v1(13.45,73.21) v1(13.52,36.41) v1(13.5,31.32) v1(13.61,39.63) v1(13.57,29.95) v1(13.8,37.86) v1(13.85,28.22) v1(13.89,21.58) v1(14.04,57.37) v1(14.05,26.44) v1(14.14,42.31) v1(14.21,13.48) v1(14.25,24.5) v1(14.42,64.48) v1(14.49,40.96) v1(14.48,17.8) v1(14.73,22.52) v1(14.84,43.67) v1(14.88,15.17) v1(15.05,29.82) v1(15.15,37.4) v1(15.17,31.26) v1(15.33,36.21) v1(15.29,18.66) v1(15.45,45.15) v1(15.46,49.55) v1(15.54,47.44) v1(15.64,21.25) v1(15.66,65.79) v1(16.07,53.33) v1(16.11,35.07) v1(16.14,33.56) v1(16.09,30.62) v1(16.07,28.46) v1(16.15,18.76) v1(16.2,26.51) v1(16.48,24.24) v1(16.81,46.12) v1(16.84,13.48) v1(16.88,44.62) v1(17.25,58.85) v1(17.24,37.63) v1(17.17,22.57) v1(17.28,73.17) v1(17.28,61.34) v1(17.29,49.6) v1(17.36,52.59) v1(17.47,34.64) v1(17.59,47.06) v1(17.61,32.71) v1(17.55,29.96) v1(17.58,27.1) v1(17.62,21.12) v1(17.94,66.14) v1(17.88,25.44) v1(18.33,43.6) v1(18.26,22.36) v1(18.36,21.12) v1(18.53,67.77) v1(18.51,36.46) v1(18.7,61.42) v1(18.75,58.91) v1(18.84,18.76) v1(19,30.89) v1(19.04,27.85) v1(19.02,24.19) v1(19.15,12.02) v1(19.26,64.39) v1(19.45,52.7) v1(19.37,32.71) v1(19.59,47.44) v1(19.8,73.08) v1(19.88,33.9) v1(19.93,15.17) v1(20.09,23.08) v1(20.14,21.09) v1(20.16,42.33) v1(20.18,40.15) v1(20.18,39.51) v1(20.44,30.94) v1(20.36,9.38) v1(20.48,27.89) v1(20.67,45.66) v1(20.72,18.73) v1(20.87,40.15) v1(21.11,24.55) v1(21.17,42.84) v1(21.28,10.09) v1(21.25,8.35) v1(21.38,13.38) v1(21.56,16.46) v1(21.71,21.76) v1(21.83,42.84) v1(22.06,62.74) v1(22.15,64.43) v1(22.23,39.78) v1(22.52,45.58) v1(22.5,18.76) v1(22.47,11.22) v1(22.53,4.27) v1(22.72,24.87) v1(22.79,34.88) v1(22.85,45) v1(22.85,44.29) v1(22.88,42.1) v1(22.88,41.39) v1(22.85,40.17) v1(23.03,67.82) v1(23.03,61.95) v1(22.96,14.61) v1(23.21,45.56) v1(23.17,27.61) v1(23.34,18.76) v1(23.61,73.21) v1(23.59,42.84) v1(23.65,5.68) v1(23.77,60.24) v1(23.78,14.15) v1(24.07,21.61) v1(24.13,18) v1(24.13,17.11) v1(24.13,10.2) v1(24.18,38.88) v1(24.58,40.15) v1(24.62,35.25) v1(24.62,33.92) v1(24.77,15.18) v1(24.95,63.69) v1(24.88,42.84) v1(24.88,5.02) v1(25,7.9) v1(25.06,22.52) v1(25.54,43.78) v1(25.54,41.95) v1(25.54,41.04) v1(25.54,39.44) v1(25.54,38.78) v1(25.54,38.14) v1(25.49,4.26) v1(25.59,59.9) v1(25.57,44.64) v1(25.82,19.62) v1(25.77,17.67) v1(25.94,64.2) v1(26.06,61.81) v1(26.2,45.58) v1(26.17,15.9) v1(26.56,5.1) v1(26.76,67.82) v1(27.02,42.84) v1(27.02,40.15) v1(27.12,55.59) v1(27.18,32.55) v1(27.42,72.98) v1(27.42,5.72) v1(27.56,25.87) v1(27.68,42.84) v1(27.68,40.15) v1(27.88,10.82) v1(27.97,62.13) v1(27.98,32.48) v1(28.02,27.6) v1(28.06,65.5) v1(28.1,19.66) v1(28.26,39.61) v1(28.31,4.27) v1(28.39,56.77) v1(28.36,43.83) v1(28.36,42.1) v1(28.4,9.55) v1(28.64,11.32) v1(28.71,13.38) v1(29.15,15.87) v1(29.45,67.96) v1(29.48,47.56) v1(29.62,8.46) v1(29.73,36.41) v1(29.67,35.12) v1(29.8,27.91) v1(29.9,64.79) v1(29.91,57.19) v1(29.96,48.05) v1(30.03,25.82) v1(30,22.39) v1(30.34,43.63) v1(30.28,17.82) v1(30.5,68.01) v1(30.47,46.14) v1(30.55,19.71) v1(30.52,11.55) v1(30.64,27.43) v1(30.7,33.67) v1(30.74,22.39) v1(30.89,65.52) v1(30.89,59.08) v1(30.85,44.87) v1(31.05,38.93) v1(31.09,35.11) v1(31.23,73.21) v1(31.44,19.27) v1(31.5,27.41) v1(31.64,48.4) v1(31.66,49.67) v1(31.69,38.29) v1(31.66,13.46) v1(31.77,44.87) v1(32.03,9.92) v1(32.1,51.4) v1(32.12,50.51) v1(32.06,30.25) v1(32.06,29.49) v1(32.2,45.58) v1(32.17,42.69) v1(32.38,49.09) v1(32.38,15.33) v1(32.5,52.29) v1(32.53,46.6) v1(32.53,37.43) v1(32.55,65.18) v1(32.55,55.69) v1(32.93,47.92) v1(32.88,8.17) v1(32.97,58.16) v1(32.99,44.8) v1(33.06,60.29) v1(33.09,42.79) v1(33.11,41.95) v1(33.34,45.56) v1(33.43,25.9) v1(33.48,30.1) v1(33.51,19.46) v1(33.59,52.31) v1(33.63,32.55) v1(33.72,11.51) v1(33.85,41.29) v1(34.2,48.81) v1(34.33,46.57) v1(34.36,40.5) v1(34.51,67.96) v1(34.66,49.88) v1(34.74,30.01) v1(34.71,13.26) v1(34.79,52.29) v1(35.02,40.45) v1(35.09,73.13) v1(35.17,48.81) v1(35.2,8.77) v1(35.36,31.56) v1(35.41,16.35) v1(35.75,45.53) v1(35.83,19.47) v1(35.82,9.5) v1(35.93,48) v1(35.93,46.6) v1(35.87,11.52) v1(35.96,52.26) v1(36.12,22.39) v1(36.11,8.16) v1(36.2,64.93) v1(36.21,41.47) v1(36.31,29.31) v1(36.35,27.08) v1(36.49,44.9) v1(36.49,44.01) v1(36.49,43.14) v1(36.49,42.26) v1(36.72,59.82) v1(36.9,51.93) v1(36.92,50.38) v1(36.9,48.99) v1(36.87,28.17) v1(37.63,47.64) v1(37.61,45.43) v1(37.61,43.22) v1(37.56,25.87) v1(37.57,4.31) v1(37.71,15.57) v1(38.09,31.58) v1(38.17,67.99) v1(38.37,19.7) v1(38.69,5.72) v1(38.87,10.1) v1(39.3,11.98) v1(39.74,65.99) v1(39.74,28.04) v1(39.73,7.74) v1(39.78,25.59) v1(39.82,10.1) v1(39.82,9.18) v1(39.92,30.79) v1(39.88,5.02) v1(40.08,73.13) v1(40.33,17.21) v1(40.3,14.8) v1(40.55,67.99) v1(40.69,4.28) v1(41.04,37.53) v1(41.1,19.7) v1(41.16,26.7) v1(41.28,29.48) v1(41.43,64.9) v1(41.44,22.46) v1(41.65,39.53) v1(41.63,30.79) v1(41.65,5.15) v1(41.66,10.24) v1(41.66,9.11) v1(42.17,14.56) v1(42.5,5.74) v1(42.6,12.64) v1(42.65,10.19) v1(42.71,28.13) v1(42.84,68.02) v1(42.78,30.98) v1(42.9,58.44) v1(42.85,15.99) v1(43.04,55.73) v1(42.99,52.78) v1(42.95,43.3) v1(43.02,40.03) v1(43.08,49.7) v1(43.32,65.98) v1(43.3,46.92) v1(43.34,9.5) v1(43.32,4.3) v1(43.4,32.31) v1(43.74,24.82) v1(43.66,17.2) v1(43.84,42.37) v1(43.93,73.21) v1(43.92,59.43) v1(44.01,29.39) v1(44.15,38.23) v1(44.15,19.7) v1(44.38,36.54) v1(44.71,32.35) v1(44.99,12.92) v1(45.15,10.15) v1(45.41,22.49) v1(45.62,24.83) v1(45.71,67.99) v1(45.69,61.05) v1(45.75,58.63) v1(45.75,15.65) v1(45.72,13.49) v1(45.79,8.16) v1(45.9,49.88) v1(45.94,46.43) v1(45.9,19.01) v1(45.9,18.24) v1(46,60.02) v1(45.98,54.23) v1(45.95,40.39) v1(46.03,38.17) v1(46.03,36.55) v1(46.04,32.35) v1(46.05,44.86) v1(46.23,17.53) v1(46.68,14.65) v1(46.79,20.93) v1(47.22,24.32) v1(47.53,15.63) v1(47.56,8.79) v1(47.86,73.14) v1(48.11,16.97) v1(48.16,9.2) v1(48.26,20.07) v1(48.33,13.44) v1(48.44,32.35) v1(48.48,58.11) v1(48.5,55.43) v1(48.5,52.23) v1(48.54,26.58) v1(48.63,22.58) v1(48.72,41.34) v1(48.8,47.2) v1(48.82,45.01) v1(49.15,37.81) v1(49.18,15.73) v1(49.27,60.01) v1(49.33,40.4) v1(49.43,64.85) v1(49.56,56.64) v1(49.56,17.02) v1(50,53.44) v1(50,39.63) v1(49.97,21) v1(49.95,8.97) v1(50.21,49.93) v1(50.18,36.57) v1(50.41,61.05) v1(50.37,58.56) v1(50.41,32.35) v1(50.47,47.21) v1(50.61,15.13) v1(50.69,8.33) v1(50.85,12.28) v1(51.11,65.71) v1(51.21,51.16) v1(51.22,9.11) v1(51.43,25.67) v1(51.63,23.61) v1(51.6,20.06) v1(51.67,59.74) v1(51.81,44.76) v1(51.78,43.93) v1(51.81,41.25) v1(51.93,39.75) v1(52.12,61.13) v1(52.1,11.75) v1(52.51,41.85) v1(52.62,39.77) v1(52.61,4.31) v1(52.71,38.26) v1(52.76,12.46) v1(53.23,52.39) v1(53.42,73.18) v1(53.44,11.73) v1(53.72,5.71) v1(53.8,38.26) v1(53.83,23.96) v1(53.84,10.19) v1(54.03,45.1) v1(53.98,32.18) v1(54.02,25.91) v1(54.22,49.95) v1(54.18,39.65) v1(54.37,66.94) v1(54.37,51.17) v1(54.42,9.18) v1(54.58,65.33) v1(54.59,4.99) v1(54.74,14.8) v1(54.73,10.29) v1(54.77,19.27) v1(54.93,49.95) v1(54.89,44.33) v1(54.91,21.22) v1(55.62,67.87) v1(55.62,49.95) v1(55.63,44.33) v1(55.58,41.58) v1(55.69,59.76) v1(55.68,4.26) v1(55.91,26.55) v1(55.97,64.94) v1(55.97,38.19) v1(56.21,18.9) v1(56.21,14.9) v1(56.21,10.29) v1(56.56,9.18) v1(56.71,7.74) v1(57.52,5.72) v1(57.6,25.33) v1(57.78,9.55) v1(58.04,70.5) v1(58.23,73.08) v1(58.42,67.01) v1(58.39,4.32) v1(58.83,24.11) v1(59.22,59.76) v1(59.41,17.11) v1(59.44,12.41) v1(59.53,63.05) v1(59.72,26.53) v1(60.18,37.71) v1(61.26,64.63) v1(61.48,67) v1(61.55,25.33) v1(61.61,8.51) v1(61.89,32.24) v1(62.54,9.38) v1(63.05,32.29) v1(63.29,64.94) v1(63.41,63.21) v1(63.44,59.69) v1(63.35,17.12) v1(63.47,26.58) v1(63.49,8.54) v1(63.55,73.12) v1(63.58,25.89) v1(63.63,12.45) v1(63.82,37.7) v1(63.97,66.64) v1(64.32,32.25) v1(64.48,69.38) v1(64.61,29.58) v1(64.79,63.46) v1(64.99,65.78) v1(65.17,36.95) v1(65.35,13.84) v1(65.55,67.41) v1(66.34,19.08) v1(66.34,16.58) v1(66.6,17.57) v1(66.68,38.42) v1(66.69,36.95) v1(67.16,64.56) v1(67.43,59.49) v1(67.8,17.59) v1(68.05,16.21) v1(68.19,26.18) v1(68.24,22.42) v1(68.25,73.19) v1(68.27,21.57) v1(68.3,20.48) v1(68.44,40.15) v1(68.53,30.84) v1(68.93,28.37) v1(69.1,20.08) v1(69.26,18.81) v1(69.28,13.71) v1(69.38,57.38) v1(69.42,23.47) v1(69.71,28.16) v1(69.84,41.38) v1(69.84,21.64) v1(69.9,20.78) v1(70.41,26.47) v1(70.41,25.48) v1(70.44,24.46) v1(70.53,65.42) v1(70.63,58.89) v1(70.56,56.28) v1(70.72,41.32) v1(70.93,18.89) v1(71.01,63.46) v1(71.12,70.32) v1(71.16,67.62) v1(71.2,21.59) v1(71.2,20.27) v1(71.35,26.44) v1(71.38,25.45) v1(71.35,24.44) v1(71.61,71.87) v1(71.8,30.62) v1(71.86,55.04) v1(71.93,13.71) v1(72.3,71.25) v1(72.34,36.59) v1(72.28,35.3) v1(72.29,26.44) v1(72.32,25.5) v1(72.32,24.46) v1(72.44,18.91) v1(72.38,16.31) v1(72.52,21.95) v1(72.57,20.3) v1(72.81,41.63) v1(72.81,40.74) v1(72.91,73.17) v1(72.94,69.45) v1(72.86,67.64) v1(72.85,64.67) v1(72.85,61.86) v1(73.48,20.6) v1(73.75,66.12) v1(73.84,60.9) v1(73.85,63.66) v1(74.22,71.19) v1(74.42,19.81) v1(74.53,23.52) v1(74.49,13.71) v1(74.63,64.38) v1(74.7,69.37) v1(74.73,66.51) v1(74.74,62.14) v1(75.14,55.07) v1(75.12,27.4) v1(75.16,59.58) v1(75.2,25.77) v1(75.31,67.55) v1(75.34,38.74) v1(75.4,41.61) v1(75.47,61.27) v1(75.54,36.48) v1(75.48,35.58) v1(75.48,15.72) v1(75.62,30.72) v1(75.61,28.95) v1(75.62,23.5) v1(75.76,65.52) v1(76.04,73.13) v1(76.06,25.82) v1(76.52,33.12) v1(76.61,21.26) v1(76.75,26.69) v1(76.77,73.13) v1(76.75,16.88) v1(76.9,66.55) v1(76.91,64.38) v1(76.9,62.16) v1(76.94,28.21) v1(76.99,22.95) v1(77.12,69.32) v1(77.14,21.98) v1(77.19,60.43) v1(77.16,25.91) v1(77.19,20.03) v1(77.22,18.81) v1(77.77,67.5) v1(77.83,26.77) v1(77.75,21.42) v1(78.31,69.31) v1(78.34,59.41) v1(78.3,55.07) v1(78.36,20.75) v1(78.51,15.85) v1(78.92,26.66) v1(79,61.13) v1(79.01,41.66) v1(79.06,66.56) v1(79.06,64.38) v1(79.06,62.14) v1(79.09,37.12) v1(79.1,30.95) v1(79.14,15.18) v1(79.31,67.62) v1(79.43,57.56) v1(79.39,20.7) v1(79.56,25.91) v1(79.87,69.33) v1(80.05,65.24) v1(80.08,63.54) v1(80.17,21.63) v1(80.33,73.14) v1(80.28,71.21) v1(80.27,56.35) v1(80.31,25.15) v1(80.32,24.2) v1(80.37,22.7) v1(80.39,17.52) v1(80.36,13.76) v1(80.94,69.18) v1(80.94,67.58) v1(80.94,65.98) v1(80.94,64.38) v1(80.94,62.78) v1(80.94,61.21) v1(80.92,59.58) v1(80.99,71.9) v1(81.44,29.17) v1(81.63,71.2) v1(81.64,55.1) v1(81.65,57.6) v1(81.8,41.61) v1(81.91,25.48) v1(82.16,13.76) v1(82.81,34.48) v1(82.91,10.3) v1(82.92,5.76) v1(82.9,0.87) v1(83.3,18.85) v1(83.48,24.36) v1(83.51,13.46) v1(83.71,39.86) v1(83.7,26.65) v1(84.36,14.35) v1(84.89,8.72) v1(85.08,3.8) v1(85.23,25.53) v1(85.26,40.95) v1(85.27,13.45) v1(86.78,1.31) v1(87.11,41.62) v1(87.14,35.96) v1(87.06,29.64) v1(87.09,23.8) v1(87.09,18.39) v1(87.09,12.64) v1(87.09,7.41)
